# Allegro board MM32SPIN27PF_V10_220608.brd
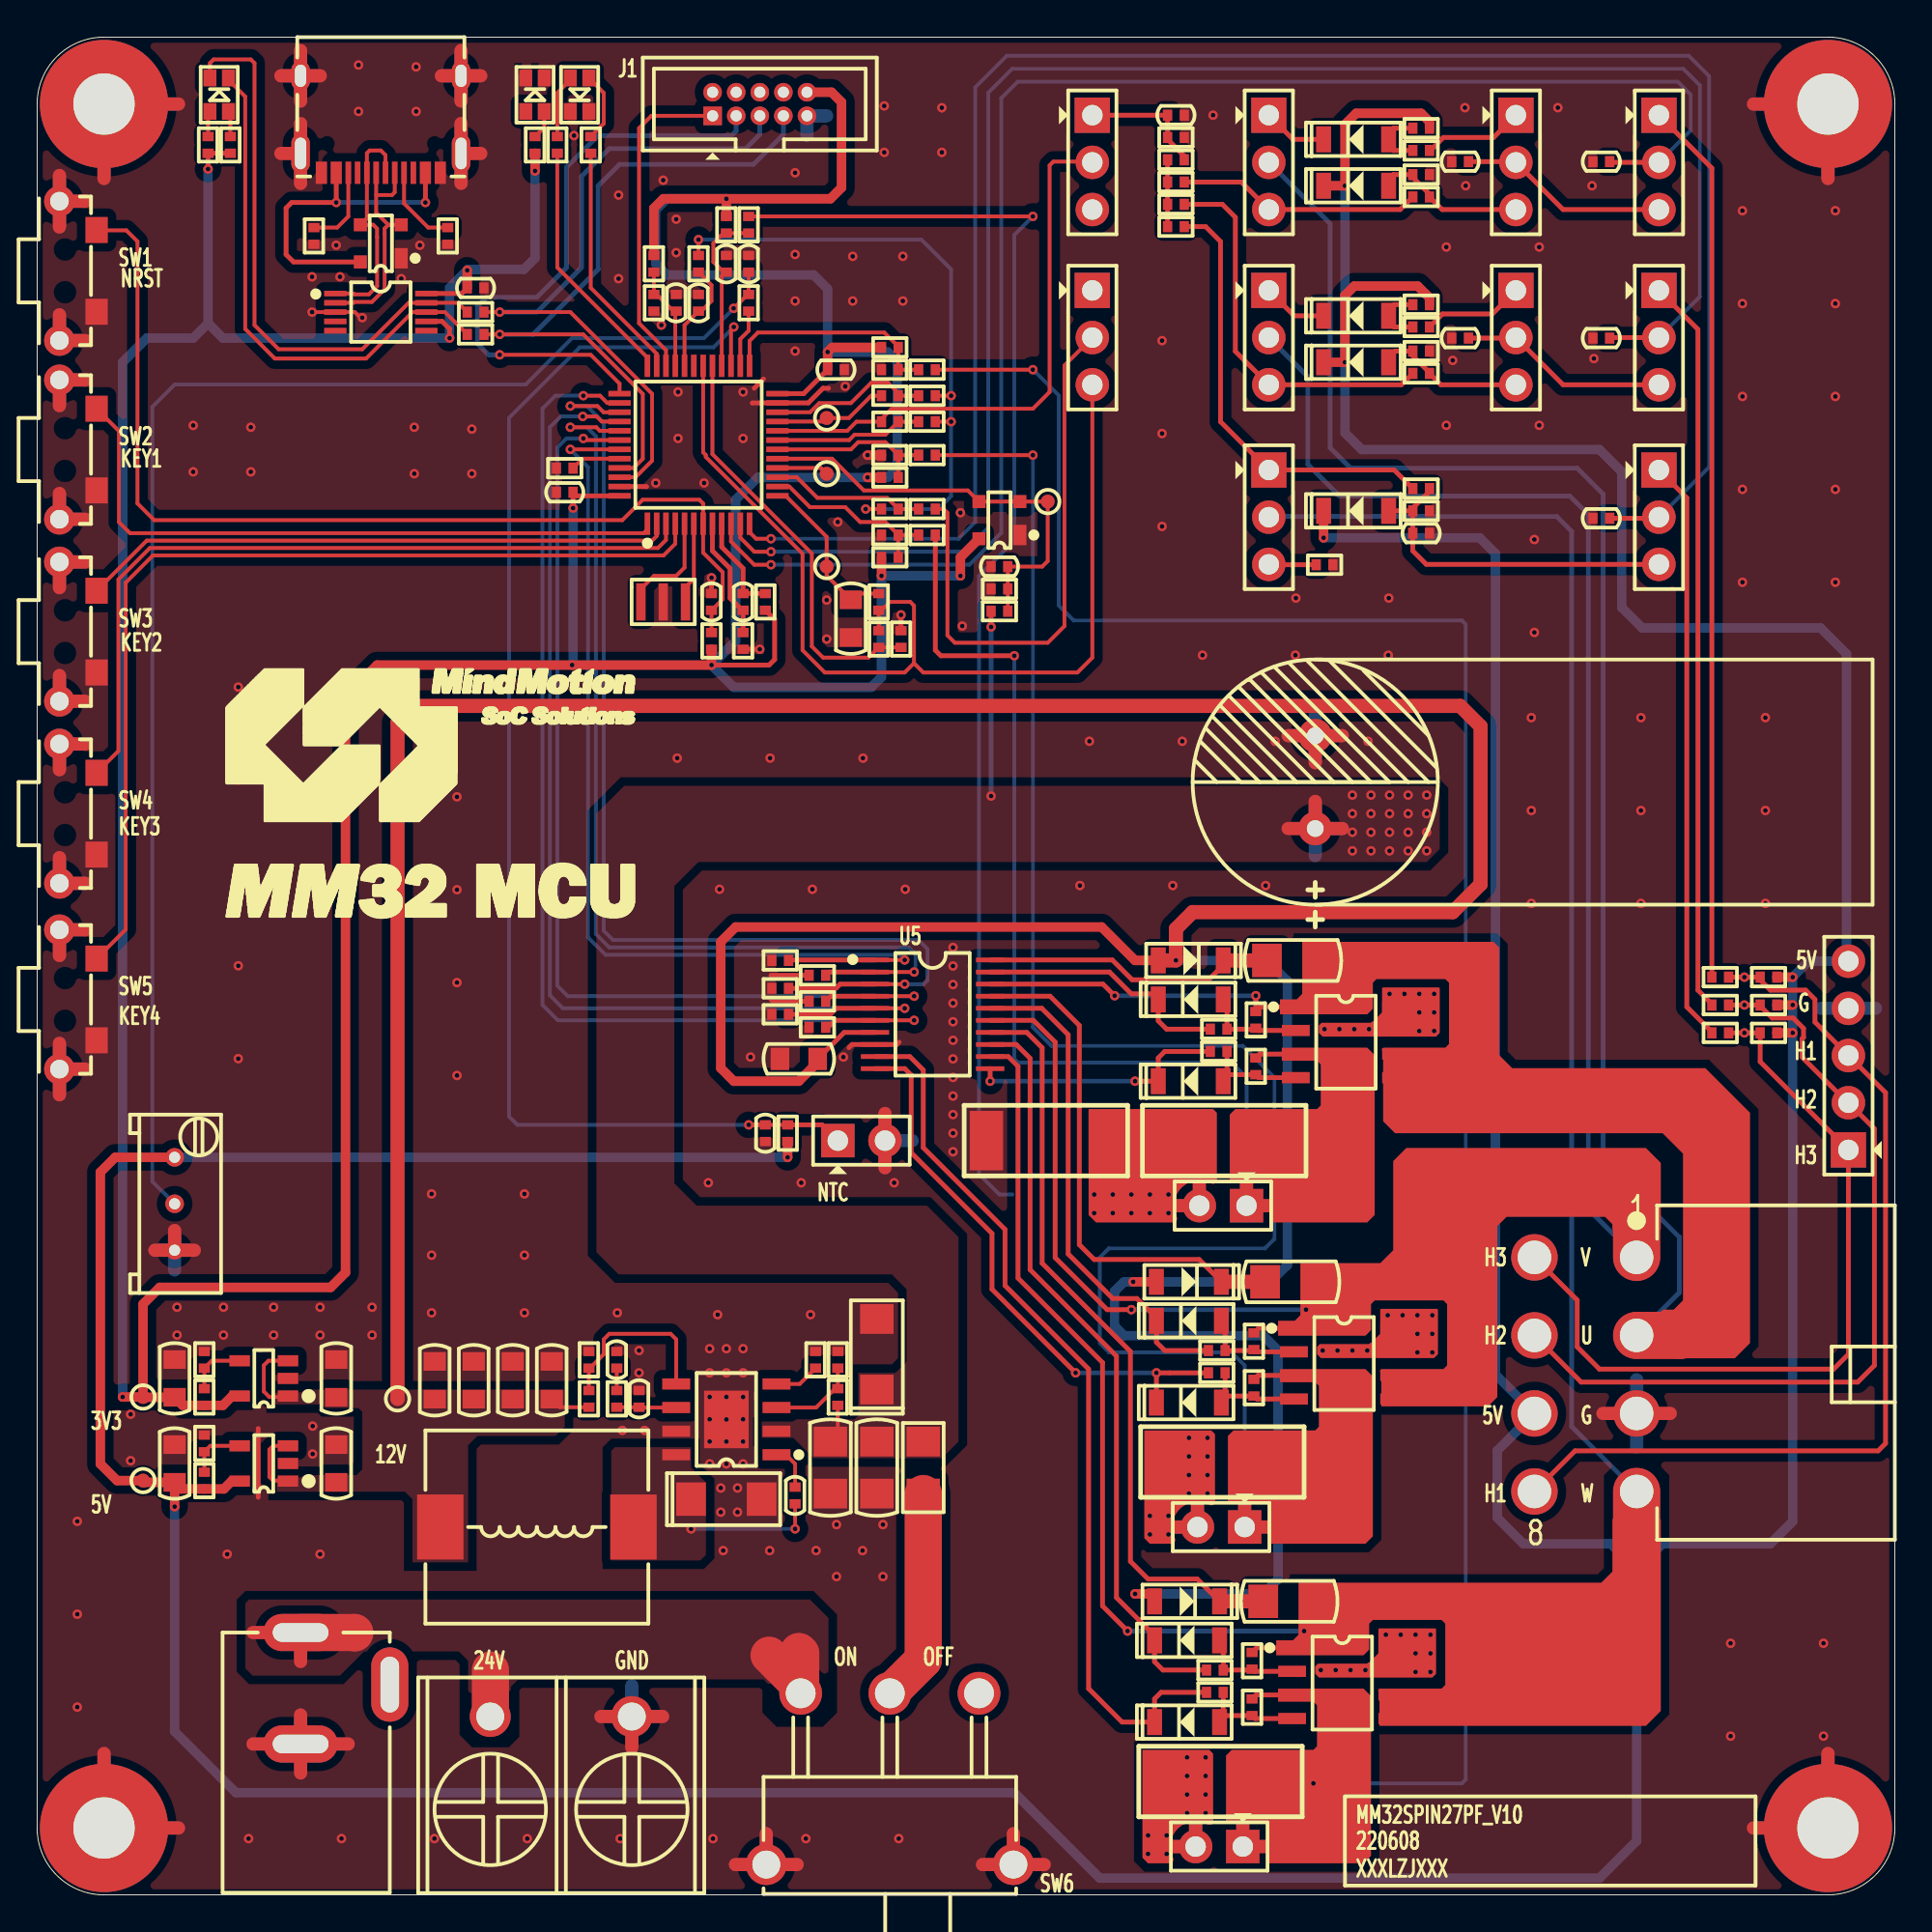
[diagram p0: board, top side]
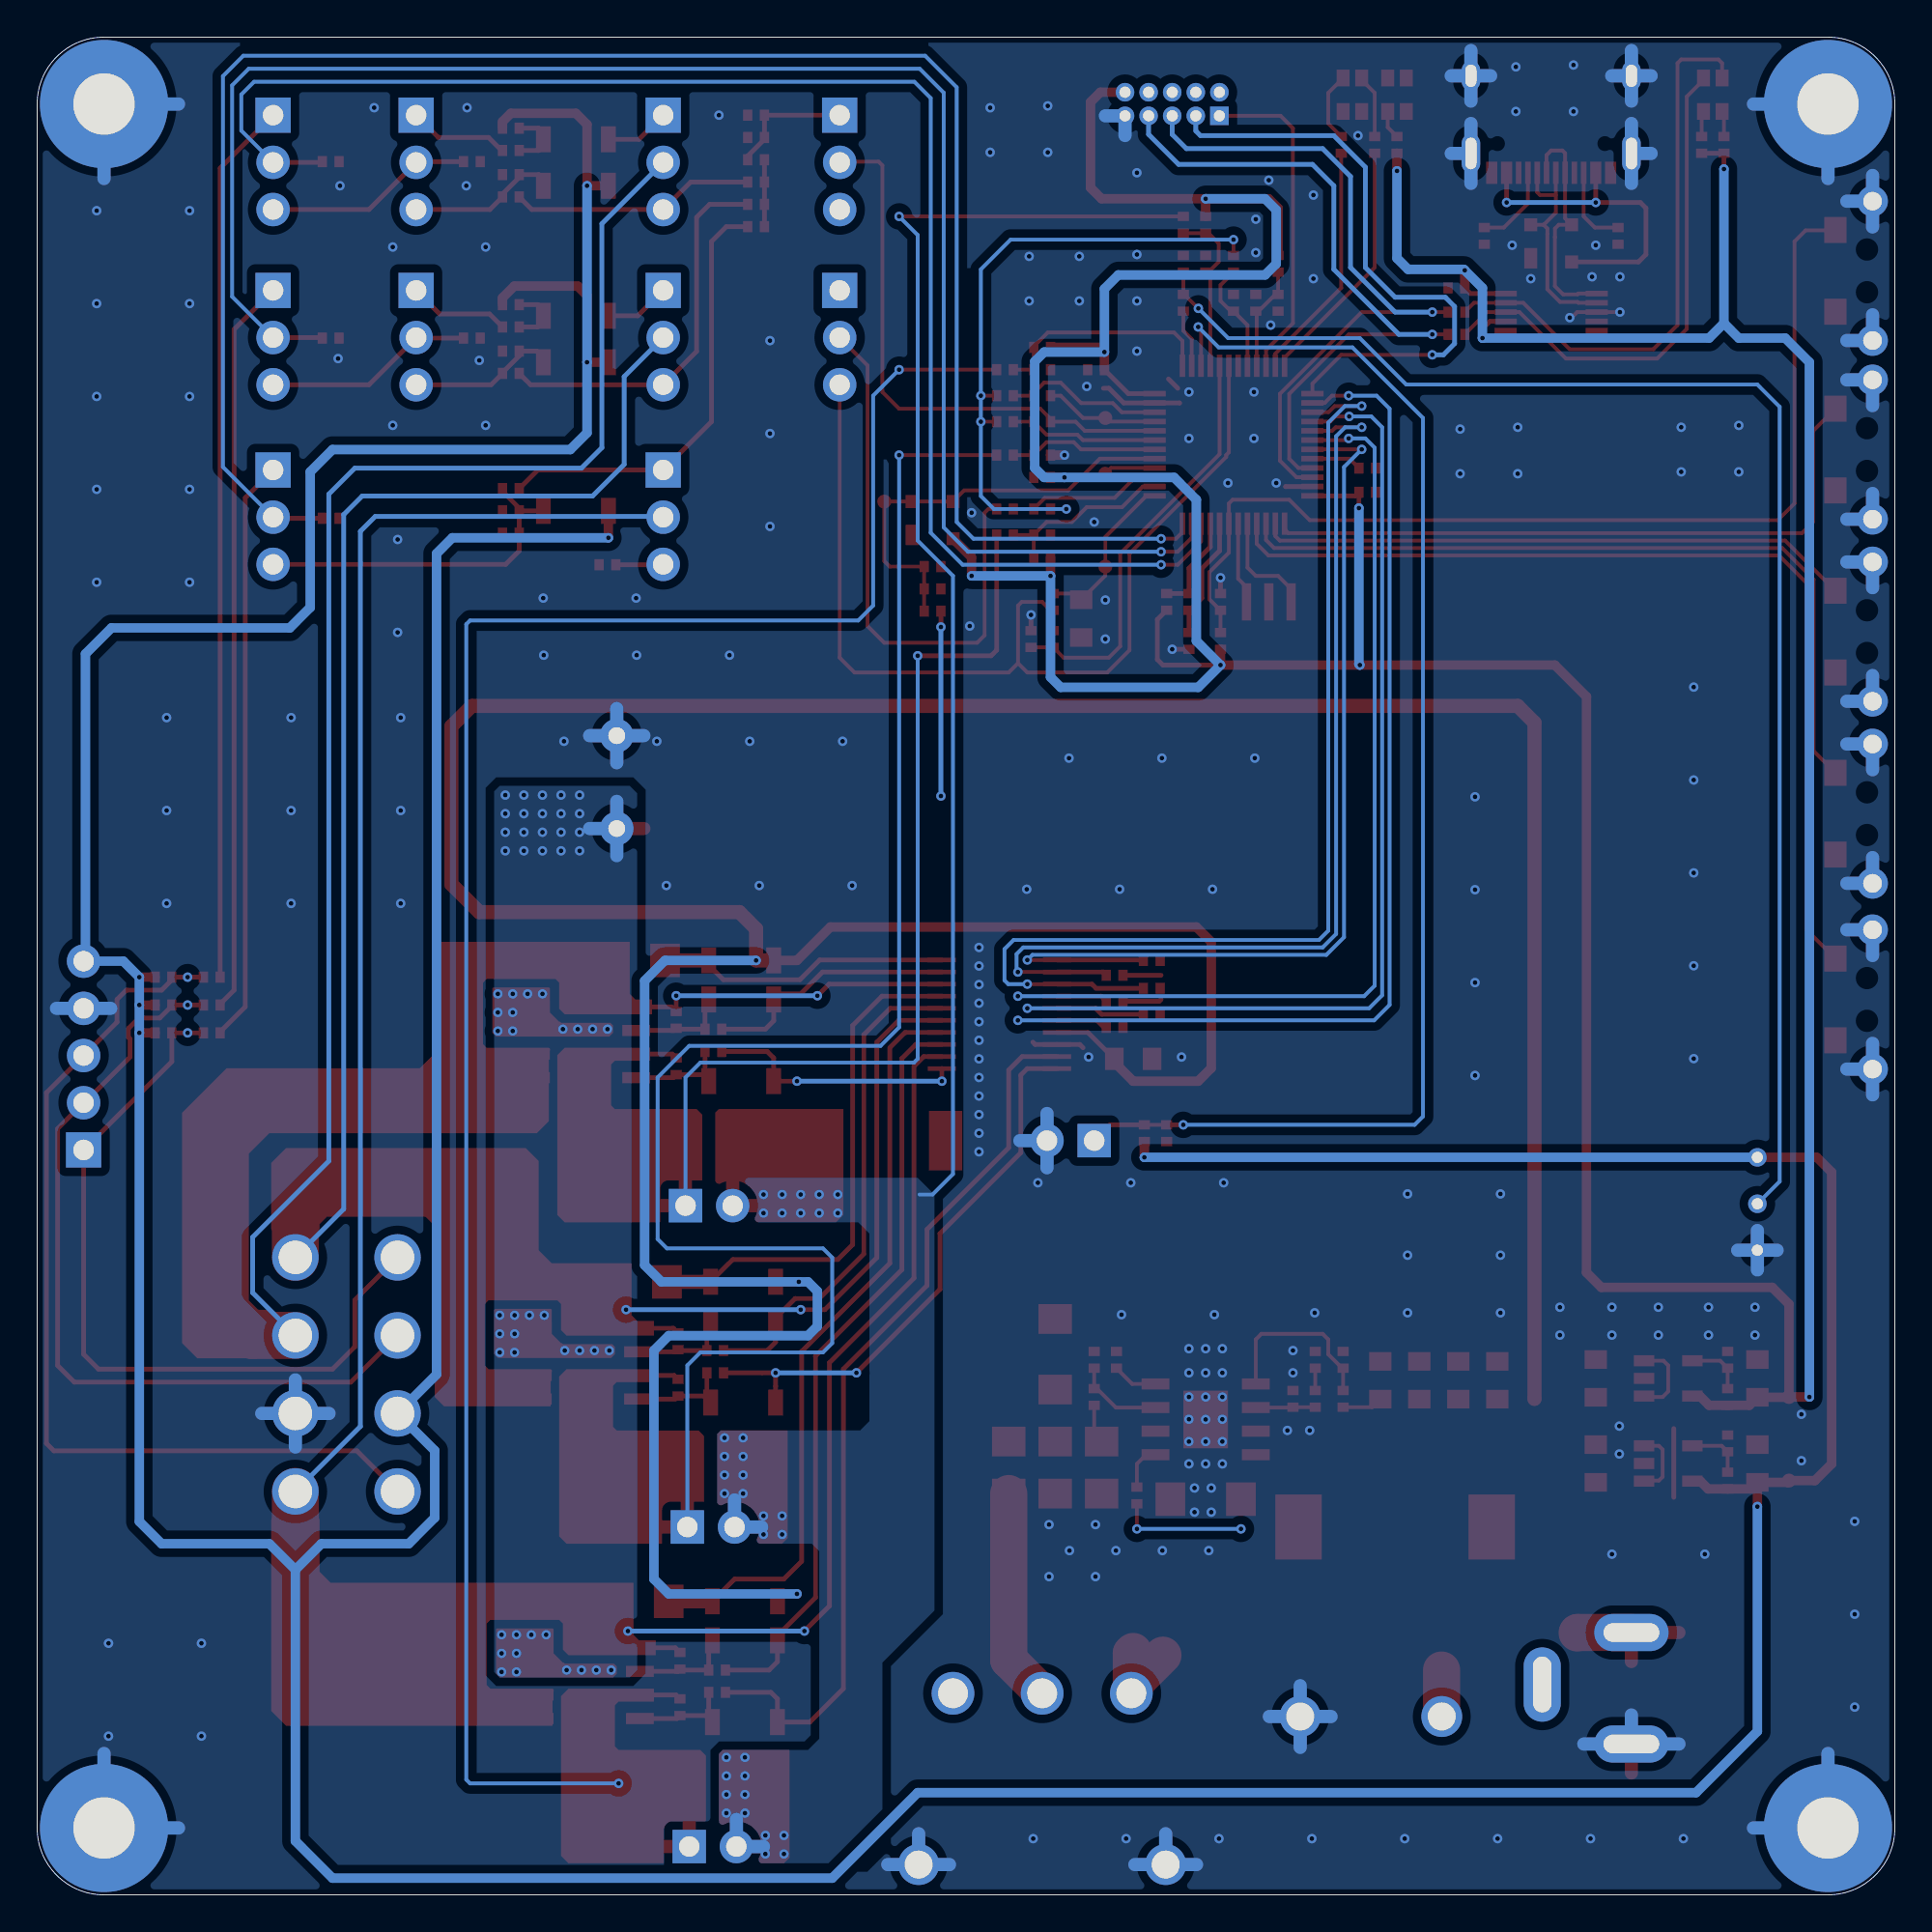
[diagram p1: board, bottom side, seen from below]

Outline 100 x 100 mm; copper layers: TOP, BOTTOM. Coordinates in mm from the lower left corner of the outline.
Outline path: 0,96.4 arc(1.05,98.95) 3.6,100 96.4,100 arc(98.95,98.95) 100,96.4 100,3.6 arc(98.95,1.05) 96.4,0 3.6,0 arc(1.05,1.05) 0,3.6 0,96.4

## Design rules (mm)
constraint set DEFAULT: min track width 0.203, pair gap 0.203
net group USB_D: nets USB_DM USB_DP

## Placement (name value [footprint] x y rotation side)
C1  4.7nF_50V/NI  [C0402]  61.3 95.8 0 top
C2  4.7nF_50V  [C0402]  76.6 93.3 180 top
C3  1nF_50V  [C0402]  84.2 93.3 180 top
C4  100nF_50V  [C0402]  39.2 41 90 top
C5  100nF_50V  [C0402]  38.3 87.8 90 top
C6  100nF_50V  [C0402]  23.6 86.5 180 top
C7  100nF_50V  [C0402]  43 82.1 0 top
C8  4.7nF_50V  [C0402]  76.6 83.8 180 top
C9  1nF_50V  [C0402]  84.2 83.8 180 top
C10  100nF_50V  [C0402]  51.8 71.5 180 top
C11  100pF_50V  [C0402]  34.4 85.7 90 top
C12  100nF_50V  [C0402]  28.4 75.5 180 top
C13  1nF_50V  [C0402]  35.6 85.7 90 top
C14  10uF_25V  [C0805]  43.8 68.7 270 top
C15  100pF_50V  [C0402]  37.1 87.8 90 top
C16  1nF_50V  [C0402]  84.2 74.1 180 top
C17  4.7nF_50V  [C0402]  74.5 73.3 0 top
C18  100nF_50V  [C0402]  36.3 69.6 90 top
C19  100nF_50V  [C0402]  38 69.6 90 top
C20  1000uF_50V  [CAP-5R0-13X27]  68.8 59.9 90 top
C21  4.7uF_50V  [C1206]  67.6 50.3 0 top
C22  10uF_25V  [C0805]  41 45 180 top
C23  4.7uF_50V  [C1206]  67.5 33 0 top
C24  10nF_50V  [C0402]  31.2 28.8 90 top
C25  10uF_25V  [C0805]  7.4 27.8 90 top
C26  10uF_25V  [C0805]  16.1 27.8 90 top
C27  10uF_25V  [C0805]  21.4 27.7 90 top
C28  10uF_25V  [C0805]  23.5 27.7 90 top
C29  10uF_25V  [C0805]  25.6 27.7 90 top
C30  10uF_25V  [C0805]  27.7 27.7 90 top
C31  47pF_50V  [C0402]  32.4 26.7 90 top
C32  10uF_25V  [C0805]  7.4 23.22 90 top
C33  10uF_25V  [C0805]  16.1 23.22 90 top
C34  10uF_50V  [C1206]  42.7 23 270 top
C35  10uF_50V  [C1206]  45.2 23 270 top
C36  100nF_50V  [C0402]  40.8 21.5 270 top
C37  4.7uF_50V  [C1206]  67.4 15.8 0 top
CN1  -  [CN1X5-2P54-Z]  97.5 40.1 90 top
D1  -  [XL-2012SURUGC]  9.8 96.9 270 top
D2  1N4148  [SOD123]  71 94.5 0 top
D3  1N4148  [SOD123]  71 92 0 top
D4  -  [XL-2012SURUGC]  26.8 96.9 270 top
D5  -  [XL-2012SURUGC]  29.2 96.9 90 top
D6  1N4148  [SOD123]  71 85 0 top
D7  1N4148  [SOD123]  71 82.5 0 top
D8  1N4148  [SOD123]  71 74.5 0 top
D9  1N4148  [SOD123]  62.1 50.3 180 top
D10  1N4148  [SOD123]  62.1 48.2 0 top
D11  1N4148  [SOD123]  62.1 43.8 0 top
D12  1N4148  [SOD123]  62 33 180 top
D13  1N4148  [SOD123]  62 30.9 0 top
D14  1N4148  [SOD123]  62 26.5 0 top
D15  SS56F  [SMAF]  45.2 29.1 270 top
D16  SS56F  [SMAF]  37.1 21.3 180 top
D17  1N4148  [SOD123]  61.9 15.8 180 top
D18  1N4148  [SOD123]  61.9 13.7 0 top
D19  1N4148  [SOD123]  61.9 9.3 0 top
DC1  -  [DC005]  14.18 8.12 90 top
F1  0469005.WR  [FUSE1206]  47.7 23 90 top
J1  -  [DC3-10P-Z]  38.9 96.4 180 top
J2  -  [HX42003-8WAF]  86.1 28.01 0 top
J3  KF7.62-2P  [KF7R62-2P]  28.2 9.6 180 top
JP1  -  [CN1X3-2P54-Z]  56.8 86.37 270 top
JP2  -  [CN1X3-2P54-Z]  56.8 95.8 270 top
JP3  -  [CN1X3-2P54-Z]  66.3 95.8 270 top
JP4  -  [CN1X3-2P54-Z]  79.6 95.8 270 top
JP5  -  [CN1X3-2P54-Z]  87.3 95.8 270 top
JP6  -  [CN1X3-2P54-Z]  66.3 86.37 270 top
JP7  -  [CN1X3-2P54-Z]  79.6 86.37 270 top
JP8  -  [CN1X3-2P54-Z]  87.3 86.37 270 top
JP9  -  [CN1X3-2P54-Z]  66.3 76.7 270 top
JP10  -  [CN1X3-2P54-Z]  87.3 76.7 270 top
JP11  -  [CN1X2-2P54-Z]  65.1 37.1 180 top
JP12  -  [CN1X2-2P54-Z]  65 19.8 180 top
JP13  -  [CN1X2-2P54-Z]  64.9 2.6 180 top
L1  SMMS1040-6R8  [L10040]  26.9 19.8 180 top
MH1  HOLE_M3/NI  [HOLE6R90X3R40]  3.6 96.4 0 top
MH2  HOLE_M3/NI  [HOLE6R90X3R40]  96.4 96.4 0 top
MH3  HOLE_M3/NI  [HOLE6R90X3R40]  3.6 3.6 0 top
MH4  HOLE_M3/NI  [HOLE6R90X3R40]  96.4 3.6 0 top
NOREF  -  []  0 0 0 top
NOREF#2  -  []  0 0 0 top
NOREF#3  -  []  0 0 90 top
NOREF#4  -  []  0 0 90 top
NOREF#5  -  []  0 0 90 top
NOREF#6  -  []  0 0 0 top
Q1  NCE6005AS  [SOIC8]  70.45 45.9 270 top
Q2  NCE6005AS  [SOIC8]  70.35 28.6 270 top
Q3  NCE6005AS  [SOIC8]  70.25 11.4 270 top
R1  10K  [R0402]  74.5 95.1 0 top
R2  4.99K/NI  [R0402]  61.3 94.6 180 top
R3  4.7K  [R0402]  9.2 94.2 270 top
R4  4.7K  [R0402]  10.4 94.2 270 top
R5  10K  [R0402]  74.5 93.9 0 top
R6  22K/NI  [R0402]  61.3 93.4 0 top
R7  10K  [R0402]  74.5 92.6 180 top
R8  27K/NI  [R0402]  61.3 92.2 180 top
R9  56K  [R0402]  74.5 91.4 0 top
R10  27K/NI  [R0402]  61.3 91 180 top
R11  27K/NI  [R0402]  61.3 89.8 180 top
R12  4.7K  [R0402]  14.9 89.3 270 top
R13  4.7K  [R0402]  22.1 89.3 90 top
R14  4.7K  [R0402]  28 94.2 90 top
R15  4.7K  [R0402]  29.8 94.2 90 top
R16  10K  [R0402]  40.4 41 270 top
R17  1K  [R0402]  38.3 85.7 270 top
R18  4.7K  [R0402]  26.8 94.2 90 top
R19  10K  [R0402]  74.5 85.6 0 top
R20  1K  [R0402]  23.6 85.2 180 top
R21  10K  [R0402]  74.5 84.4 0 top
R22  1K  [R0402]  23.6 84 180 top
R23  10K  [R0402]  74.5 83.1 180 top
R24  10K  [R0402]  45.9 77.5 180 top
R25  56K  [R0402]  74.5 81.9 0 top
R26  10K  [R0402]  45.9 76.3 0 top
R27  4.99K  [R0402]  47.9 74.6 0 top
R28  10K  [R0402]  28.4 76.8 0 top
R29  10K  [R0402]  45.9 83.3 0 top
R30  1K  [R0402]  47.9 79.3 180 top
R31  10K  [R0402]  51.8 70.3 0 top
R32  4.99K  [R0402]  45.9 79.3 180 top
R33  10K  [R0402]  45.9 82.1 180 top
R34  1K  [R0402]  47.9 77.5 180 top
R35  10K  [R0402]  45.9 72 0 top
R36  100K  [R0402]  51.8 69.1 180 top
R37  1K  [R0402]  47.9 80.7 180 top
R38  1.2K  [R0402]  38.3 89.9 270 top
R39  10K  [R0402]  45.9 73.2 180 top
R40  1K  [R0402]  47.9 82.1 180 top
R41  6.2K  [R0402]  45.3 67.6 90 top
R42  10K  [R0402]  46.5 67.6 90 top
R43  1K  [R0402]  45.9 74.6 0 top
R44  4.99K  [R0402]  45.9 80.7 180 top
R45  2K  [R0402]  33.2 85.7 270 top
R46  56K  [R0402]  74.5 75.7 0 top
R47  10K  [R0402]  45.3 69.6 90 top
R48  1K  [R0402]  47.9 73.2 180 top
R49  10K  [R0402]  74.5 74.5 180 top
R50  10K  [R0402]  33.2 87.8 270 top
R51  1K  [R0402]  35.6 87.8 270 top
R52  0R  [R0402]  39.2 69.6 270 top
R53  36K  [R0402]  37.1 89.9 270 top
R54  10K  [R0402]  69.3 71.6 180 top
R55  10K  [R0402]  36.3 67.5 90 top
R56  0R  [R0402]  38 67.5 270 top
R57  10K/NI  [R0402]  40 50.3 180 top
R58  100R  [R0402]  90.6 46.4 180 top
R59  4.7K  [R0402]  93.2 46.4 0 top
R60  10K/NI  [R0402]  42 49.5 180 top
R61  10K/NI  [R0402]  40 48.8 180 top
R62  10K/NI  [R0402]  42 48.1 180 top
R63  100R  [R0402]  90.6 47.9 180 top
R64  4.7K  [R0402]  93.2 47.9 0 top
R65  10K/NI  [R0402]  40 47.4 180 top
R66  10K  [R0402]  65.6 47.1 90 top
R67  10K/NI  [R0402]  42 46.7 180 top
R68  100R  [R0402]  63.6 46.6 0 top
R69  100R  [R0402]  63.6 45.4 0 top
R70  100R  [R0402]  90.6 49.4 180 top
R71  4.7K  [R0402]  93.2 49.4 0 top
R72  10K  [R0402]  65.6 44.6 270 top
R73  0R05  [R2512]  54.3 40.6 0 top
R74  0R05  [R2512]  63.9 40.6 0 top
R75  MF52A103F3950(A1)  [CN1X2-2P54-Z]  43.1 40.6 0 top
R76  10K  [R0402]  65.5 29.8 90 top
R77  100R  [R0402]  63.5 29.3 0 top
R78  20K  [R0402]  9 28.8 90 top
R79  14.3K  [R0402]  29.7 28.8 90 top
R80  200K  [R0402]  41.9 28.8 270 top
R81  75K  [R0402]  43.1 28.8 270 top
R82  100R  [R0402]  63.5 28.1 0 top
R83  10K  [R0402]  65.5 27.3 270 top
R84  33K  [R0402]  9 26.8 90 top
R85  330K  [R0402]  43.1 26.8 270 top
R86  200K  [R0402]  29.7 26.7 90 top
R87  10K  [R0402]  31.2 26.7 270 top
R88  20K  [R0402]  9 24.3 90 top
R89  0R05  [R2512]  63.8 23.3 0 top
R90  63.4K  [R0402]  9 22.3 90 top
R91  10K  [R0402]  65.4 12.6 90 top
R92  100R  [R0402]  63.4 12.1 0 top
R93  100R  [R0402]  63.4 10.9 0 top
R94  10K  [R0402]  65.4 10.1 270 top
R95  0R05  [R2512]  63.7 6.1 0 top
RP1  3296W-1-503  [3296W]  7.4 37.2 90 top
SW1  -  [K2-1112SW-A4SW-04]  1.5 87.42 90 top
SW2  -  [K2-1112SW-A4SW-04]  1.5 77.8 90 top
SW3  -  [K2-1112SW-A4SW-04]  1.5 68 90 top
SW4  -  [K2-1112SW-A4SW-04]  1.5 58.2 90 top
SW5  -  [K2-1112SW-A4SW-04]  1.5 48.2 90 top
SW6  -  [SS-12D11G3R]  45.9 3.2 180 top
TP1  TP/NI  [TP-0R75]  54.4 75 0 top
TP2  TP/NI  [TP-0R75]  42.5 79.5 0 top
TP3  TP/NI  [TP-0R75]  42.5 76.5 0 top
TP4  TP/NI  [TP-0R75]  42.5 71.5 0 top
TP5  TestPoint/NI  [TP-0R75]  5.7 26.8 0 top
TP6  TP/NI  [TP-0R75]  19.4 26.7 180 top
TP7  TestPoint/NI  [TP-0R75]  5.7 22.3 0 top
U1  PRTR5V0U2X  [SOT143B]  18.5 88.9 90 top
U2  CH340E  [MSOP10]  18.5 85.2 270 top
U3  MM32SPIN27PF  [LQFP48-7X7X0R5]  35.6 78.06 0 top
U4  PRTR5V0U2X  [SOT143B]  51.8 74 90 top
U5  EG2124A  [TSSOP20]  48.2 47.4 270 top
U6  SPX3819M5-L-ADJ  [SOT23-5]  12.2 27.8 90 top
U7  TPS54340DDAR  [SOIC8-3R10X2R40]  37.1 25.59 90 top
U8  SPX3819M5-L-ADJ  [SOT23-5]  12.2 23.22 90 top
USB1  -  [TYPE-C-31-M-12]  18.5 92.7 180 top
X1  CSTCE8M00G15C99-R0  [X-3P-3R2X1R3-SMD]  33.7 69.6 0 top

## Library data of the parts
C1-C5 C8-C11 C13-C17 C24-C36 = CAP NP_3
C6 C7 C12 C19 = CAP NP_2
C18 C21-C23 C37 = CAP NP
C20 = CAPT_100UF_3528_6r3V_10%_LXXXX
CN1 = CONN RCPT 5
D1 D4 D5 = XL-2012SURUGC
D2 D3 D6-D19 = DIODE13_9
DC1 = DC005
F1 = FUSE
J1 = DC3-10P-Z-L
J2 = HX30002-10A_2
J3 JP11-JP13 R75 = CONN RCPT 2
JP1-JP10 = CONN RCPT 3
L1 = INDUCTOR_0
MH1-MH4 = Hold_1
Q1-Q3 = IRF7351TRPBF
R1-R74 R76-R95 = R_Generic
RP1 = 3296W-1-503
SW1-SW5 = SWITCH-SPST-4P
SW6 = SWITCH_3P
TP1-TP7 = TestPoint
U1 U4 = PRTR5V0U2X
U2 = CH340E
U3 = MM32SPIN27PF
U5 = EG2124A
U6 U8 = SPX3819M5-L-1-2
U7 = TPS54340DDAR
USB1 = TYPE-C_0
X1 = XTAL_5032_0

## Footprints (pads in the part's own frame, mm; a bottom-side part is the same pattern mirrored in y, then rotated)
3296W
  round 1 hole 0.6: 1(-2.5,0) 2(0,0) 3(2.5,0)
C0402
  rect 0.5x0.6 smd: 1(-0.45,0) 2(0.45,0)
C0805
  rect 1x1.2 smd: 1(-1.016,0) 2(1.016,0)
C1206
  rect 1.6x1.8 smd: 1(-1.4,0) 2(1.4,0)
CAP-5R0-13X27
  round 1.8 hole 0.9: 1(-2.5,0) 2(2.5,0)
CN1X2-2P54-Z
  rect 1.8x1.8 hole 1.1: 1(0,0)
  round 1.8 hole 1.1: 2(2.54,0)
CN1X3-2P54-Z
  rect 1.9x1.9 hole 1.1: 1(0,0)
  round 1.8 hole 1.1: 2(2.54,0) 3(5.08,0)
CN1X5-2P54-Z
  rect 1.9x1.9 hole 1.1: 1(0,0)
  round 1.8 hole 1.1: 2(2.54,0) 3(5.08,0) 4(7.62,0) 5(10.16,0)
DC3-10P-Z
  rect 1x1 hole 0.6: 1(2.54,0.635)
  round 1 hole 0.6: 2(2.54,-0.635) 3(1.27,0.635) 4(1.27,-0.635) 5(0,0.635) 6(0,-0.635) 7(-1.27,0.635) 8(-1.27,-0.635) 9(-2.54,0.635) 10(-2.54,-0.635)
DC005
  oval 2x4 hole 1x3: 1(6,0) 2(0,0)
  oval 4x2 hole 3x1: 3(3.2,-4.8)
FUSE1206
  rect 1.6x1.8 smd: 1(-1.4,0) 2(1.4,0)
HOLE6R90X3R40
  round 6.9 hole 3.3: 1(0,0)
HX42003-8WAF
  round 2.5 hole 1.8: 1(0,6.3) 2(0,2.1) 3(0,-2.1) 4(0,-6.3) 5(-5.5,6.3) 6(-5.5,2.1) 7(-5.5,-2.1) 8(-5.5,-6.3)
K2-1112SW-A4SW-04
  round 1.65 hole 1: 1(-3.75,0.3) 4(3.75,0.3)
  rect 1.4x1.2 smd: 2(-2.2,-1.7) 3(2.2,-1.7)
KF7R62-2P
  round 2.2 hole 1.5: 1(-3.81,0) 2(3.81,0)
L10040
  rect 2.5x3.5 smd: 1(-5.2,0) 2(5.2,0)
LQFP48-7X7X0R5
  rect 0.3x1.2 smd: 1(-2.75,-4.25) 2(-2.25,-4.25) 3(-1.75,-4.25) 4(-1.25,-4.25) 5(-0.75,-4.25) 6(-0.25,-4.25) 7(0.25,-4.25) 8(0.75,-4.25) 9(1.25,-4.25) 10(1.75,-4.25) 11(2.25,-4.25) 12(2.75,-4.25) 25(2.75,4.25) 26(2.25,4.25) 27(1.75,4.25) 28(1.25,4.25) 29(0.75,4.25) 30(0.25,4.25) 31(-0.25,4.25) 32(-0.75,4.25) 33(-1.25,4.25) 34(-1.75,4.25) 35(-2.25,4.25) 36(-2.75,4.25)
  rect 1.2x0.3 smd: 13(4.25,-2.75) 14(4.25,-2.25) 15(4.25,-1.75) 16(4.25,-1.25) 17(4.25,-0.75) 18(4.25,-0.25) 19(4.25,0.25) 20(4.25,0.75) 21(4.25,1.25) 22(4.25,1.75) 23(4.25,2.25) 24(4.25,2.75) 37(-4.25,2.75) 38(-4.25,2.25) 39(-4.25,1.75) 40(-4.25,1.25) 41(-4.25,0.75) 42(-4.25,0.25) 43(-4.25,-0.25) 44(-4.25,-0.75) 45(-4.25,-1.25) 46(-4.25,-1.75) 47(-4.25,-2.25) 48(-4.25,-2.75)
MSOP10
  rect 0.3x1.2 smd: 1(-1,-2.45) 2(-0.5,-2.45) 3(0,-2.45) 4(0.5,-2.45) 5(1,-2.45) 6(1,2.45) 7(0.5,2.45) 8(0,2.45) 9(-0.5,2.45) 10(-1,2.45)
R0402
  rect 0.5x0.6 smd: 1(-0.45,0) 2(0.45,0)
R2512
  rect 1.8x3.2 smd: 1(-3.2,0) 2(3.2,0)
SMAF
  rect 1.6x1.8 smd: 1(-1.9,0) 2(1.9,0)
SOD123
  rect 0.8x1.4 smd: 1(1.75,0) 2(-1.75,0)
SOIC8
  rect 0.6x1.5 smd: 1(-1.9,-2.7) 2(-0.63,-2.7) 3(0.64,-2.7) 4(1.91,-2.7) 5(1.91,2.7) 6(0.64,2.7) 7(-0.63,2.7) 8(-1.9,2.7)
SOIC8-3R10X2R40
  rect 0.6x1.5 smd: 1(-1.9,-2.7) 2(-0.63,-2.7) 3(0.64,-2.7) 4(1.91,-2.7) 5(1.91,2.7) 6(0.64,2.7) 7(-0.63,2.7) 8(-1.9,2.7)
  rect 3.1x2.4 smd: 9(0,0)
SOT23-5
  rect 0.6x1.1 smd: 1(-0.95,-1.3) 2(0,-1.3) 3(0.95,-1.3) 4(0.95,1.3) 5(-0.95,1.3)
SOT143B
  rect 1.1x0.7 smd: 1(-0.8,-1.1)
  rect 0.7x0.7 smd: 2(1,-1.1) 3(1,1.1) 4(-1,1.1)
SS-12D11G3R
  round 2.2 hole 1.5: 1(-6.65,1.57) 5(6.65,1.57)
  round 2.3 hole 1.6: 2(-4.8,-7.65) 3(0,-7.65) 4(4.8,-7.65)
TP-0R75
  round 0.75 smd: 1(0,0)
TSSOP20
  rect 0.25x1.52 smd: 1(-2.925,-3.1) 2(-2.275,-3.1) 3(-1.625,-3.1) 4(-0.975,-3.1) 5(-0.325,-3.1) 6(0.325,-3.1) 7(0.975,-3.1) 8(1.625,-3.1) 9(2.275,-3.1) 10(2.925,-3.1) 11(2.925,3.1) 12(2.275,3.1) 13(1.625,3.1) 14(0.975,3.1) 15(0.325,3.1) 16(-0.325,3.1) 17(-0.975,3.1) 18(-1.625,3.1) 19(-2.275,3.1) 20(-2.925,3.1)
TYPE-C-31-M-12
  rect 0.6x1.2 smd: 1(-3.2,0) 2(-2.4,0) 11(2.4,0) 12(3.2,0)
  rect 0.3x1.2 smd: 3(-1.75,0) 4(-1.25,0) 5(-0.75,0) 6(-0.25,0) 7(0.25,0) 8(0.75,0) 9(1.25,0) 10(1.75,0)
  oval 1x2.1 hole 0.6x1.7: 13(-4.32,-1.04) 14(4.32,-1.04)
  oval 1x1.6 hole 0.6x1.2: 15(-4.32,-5.22) 16(4.32,-5.22)
X-3P-3R2X1R3-SMD
  rect 0.5x2 smd: 1(-1.2,0) 2(0,0) 3(1.2,0)
XL-2012SURUGC
  rect 0.9x0.7 smd: 1(-0.9,0.5) 2(0.9,0.5) 3(-0.9,-0.5) 4(0.9,-0.5)

## Nets
GND: C1.2 C2.2 C3.2 C4.1 C5.2 C6.1 C7.2 C8.2 C9.2 C10.2 C11.2 C12.2 C13.2 C14.2 C15.2 C16.2 C17.2 C18.2 C20.2 C22.2 C24.2 C25.2 C26.2 C27.2 C28.2 C29.2 C30.2 C31.2 C32.2 C33.2 C34.2 C35.2 CN1.4 D4.1(R-) D4.3 D5.1(R-) D5.3 D15.1 D16.1 DC1.2 J1.9 J2.3 J3.1 MH1.1 MH2.1 MH3.1 MH4.1 R2.1 R7.1 R12.2 R13.1 R23.1 R24.2 R28.1 R31.1 R33.2 R39.2 R42.2 R45.2 R49.1 R54.1 R56.2 R57.2 R60.2 R61.2 R62.2 R65.2 R67.2 R73.1 R75.2 R78.2 R79.2 R80.1 R81.1 R88.2 RP1.1 SW1.1 SW1.2 SW1.4 SW2.1 SW2.2 SW2.4 SW3.1 SW3.2 SW3.4 SW4.1 SW4.2 SW4.4 SW5.1 SW5.2 SW5.4 SW6.1 SW6.5 U1.1 U2.3 U3.23 U3.47(VSS_2) U4.1 U5.8 U6.2 U7.7 U7.9 U8.2 USB1.1 USB1.12 USB1.13 USB1.14 USB1.15 USB1.16 X1.2
VCC_3.3V: C6.2 C7.1 C12.1 C25.1 J1.10 R3.2 R4.2 R18.1 R26.1 R29.1 R35.1 R50.1 R52.2 R53.1 R55.1 R84.1 TP5.1 U2.7(VCC) U2.10 U3.24 U3.48 U4.4 U6.5(VOUT)
VCC_5V: C32.1 CN1.5 D3.2(ANODE_2) D7.2(ANODE_2) D8.2(ANODE_2) J2.7 R1.2 R16.2 R19.2 R59.2 R64.2 R71.2 R90.1 RP1.3 TP7.1 U8.5(VOUT)
VCC_5V_USB: U1.4 USB1.2 USB1.11(VBUS2)
VCC_12V: C22.1 C26.1 C27.1 C28.1 C29.1 C30.1 C33.1 D9.1 D12.1 D17.1 L1.2 R86.1 TP6.1 U5.7 U6.1 U6.3 U8.1 U8.3
VCC_24V: C20.1 C34.1 C35.1 D15.2(ANODE_2) F1.2 Q1.7 Q1.8 Q2.7 Q2.8 Q3.7 Q3.8 R36.2 R85.2 U7.2(VIN)
VCC_24V_IN: DC1.1 J3.2 SW6.4
VDDA: C19.2 R52.1 U3.9
VSSA: C19.1 R56.1 U3.8
BEMF_O: JP2.2 R32.2 U3.20
CH340E_RXD: D1.3 R20.2 U2.9
CH340E_TXD: D1.1(R-) R22.2 U2.8
H1: CN1.3 J2.8 R70.1 R71.1
H2: CN1.2 J2.6 R63.1 R64.1
H3: CN1.1 J2.5 R58.1 R59.1
HO1: D10.2(ANODE_2) R68.1 U5.19
HO2: D13.2(ANODE_2) R77.1 U5.16
HO3: D18.2(ANODE_2) R92.1 U5.13
IR_SUM: JP11.2 JP12.2 JP13.2 R38.1 R73.2 R74.1 R89.1 R95.1
IR_U: JP11.1 Q1.3(S2) R48.1 R72.1 R74.2
IR_V: JP12.1 Q2.3(S2) R34.1 R83.1 R89.2
IR_W: JP13.1 Q3.3(S2) R40.1 R94.1 R95.2
LO1: D11.2(ANODE_2) R69.1 U5.11
LO2: D14.2(ANODE_2) R82.1 U5.10
LO3: D19.2(ANODE_2) R93.1 U5.9
MOTOR_U: C21.2 J2.2 JP3.2 Q1.1 Q1.5 Q1.6 R66.2 U5.18
MOTOR_V: C23.2 J2.1 JP6.2 Q2.1 Q2.5 Q2.6 R76.2 U5.15
MOTOR_W: C37.2 J2.4 JP9.2 Q3.1 Q3.5 Q3.6 R91.2 U5.12(VS3)
NRST: C18.1 R55.2 SW1.3 U3.7
OSC_IN: U3.5 X1.1
OSC_OUT: U3.6 X1.3
PA0/BEMF_U: C3.1 JP5.2 U3.10
PA1/BEMF_V: C9.1 JP8.2 U3.11
PA2/BEMF_W: C16.1 JP10.2 U3.12
PA3: C14.1 R47.2 TP4.1 U3.13
PA4: R35.2 R39.1 R48.2 U3.14
PA5: R27.1 R43.2 U3.15
PA6: TP3.1 U3.16
PA7/VDC: C10.1 R31.2 R36.1 TP1.1 U3.17 U4.2 U4.3
PA8: R41.1 R42.1 U3.29
PA11: C13.1 R51.2 U3.32
PA12: C11.1 R45.1 R50.2 U3.33
PA15/TIM_CH3N: R67.1 U3.38 U5.6
PB0: R24.1 R26.2 R34.2 U3.18
PB1: R30.2 R32.1 U3.19
PB3/TIM_CH3: R61.1 U3.39 U5.3
PB4/TIM_CH2N: R65.1 U3.40 U5.5
PB5/TIM_CH2: R60.1 U3.41 U5.2
PB6/TIM_CH1N: R62.1 U3.42 U5.4
PB7/TIM_CH1: R57.1 U3.43 U5.1
PB8/UART1_RX: J1.7 R22.1 U3.45
PB9/UART1_TX: J1.5 R20.1 U3.46
PB10: R44.2 TP2.1 U3.21
PB11: R37.2 R44.1 U3.22
PB12: R29.2 R33.1 R40.2 U3.25
PB13/SPEED: R17.2 U3.26
PB14/TEMP: C4.2 R16.1 R75.1 U3.27
PB15: C15.1 R38.2 R53.2 U3.28
PC13/KEY2: SW3.3 U3.2
PC14/KEY3: SW4.3 U3.3
PC15/KEY4: SW5.3 U3.4
PD2/LED0: R15.1 U3.35
PD3/LED1: R14.1 U3.36
PD7/KEY1: SW2.3 U3.1
SV: JP1.3 R41.2 R47.1 U3.30
SWCLK: J1.3 U3.37
SWDIO: J1.1 U3.34
U_S_IN: JP1.2 R27.2
USB_DM: U1.2 U2.2 USB1.5 USB1.7
USB_DP: U1.3 U2.1 USB1.6 USB1.8
UV: JP1.1
VB1: C21.1 D9.2(ANODE_2) U5.20
VB2: C23.1 D12.2(ANODE_2) U5.17
VB3: C37.1 D17.2(ANODE_2) U5.14
VV: JP2.3
N17256471: R28.2 U3.44
N17256486: D4.2 R18.2
N17256513: R12.1 USB1.10
N17256515: R13.2 USB1.4
N17279585: D1.2 R4.1
N17279608: D1.4 R3.1
N17297966: R30.1 R37.1 R43.1 R51.1
N17303513: D10.1 Q1.2 R66.1 R68.2
N17303600: D11.1 Q1.4 R69.2 R72.2
N17305088: D13.1 Q2.2 R76.1 R77.2
N17305164: D14.1 Q2.4 R82.2 R83.2
N17305624: D18.1 Q3.2 R91.1 R92.2
N17305700: D19.1 Q3.4 R93.2 R94.2
N17307857: C5.1 R17.1 RP1.2
N17309304: D2.1 R1.1 R5.1
N17309352: D2.2(ANODE_2) JP3.1
N17309419: D3.1 JP4.3 R7.2 R9.2
N17309488: JP4.1 R5.2
N17309495: JP3.3 R8.1 R9.1
N17309514: C2.1 JP4.2 JP5.3
N17309709: JP5.1 R70.2
N17309934: JP8.1 R63.2
N17309953: D6.1 R19.1 R21.1
N17309955: D7.1 JP7.3 R23.2 R25.2
N17309983: D6.2(ANODE_2) JP6.1
N17309989: JP7.1 R21.2
N17310005: C8.1 JP7.2 JP8.3
N17310013: JP6.3 R10.1 R25.1
N17310426: C17.1 D8.1 JP10.3 R46.2 R49.2
N17310462: JP10.1 R58.2
N17310486: JP9.3 R54.2
N17311196: JP9.1 R11.1 R46.1
N17311295: R6.1 R8.2 R10.2 R11.2
N17311437: C1.1 JP2.1 R2.2 R6.2
N17322936: D5.2 R14.2
N17322948: D5.4 R15.2
N17331274: F1.1 SW6.3
N17333710: R78.1 R84.2 U6.4
N17334296: R88.1 R90.2 U8.4
N17334949: C36.1 U7.1
N17334953: C36.2 D16.2(ANODE_2) L1.1 U7.8
N17335086: R79.1 R86.2 U7.5
N17335114: R81.2 R85.1 U7.3
N17335118: C31.1 R87.2 U7.6
N17335142: R80.2 U7.4
N17335200: C24.1 R87.1

Pads without a net: D4 4; DC1 3; J1 2 4 6 8; SW6 2; U2 4 5 6; U3 31; USB1 3 9

## Via types
v1: diameter 0.508, hole 0.254, TOP to BOTTOM, 370 vias

## Routing (per net, layer and track width the routed paths; a pad name or vN(x,y) marks a point on that pad's centre or on a via; arc(x,y) is an arc through that point)
GND: length 272.1
  TOP w0.203: 17.3,85 17.1,85.2 U2.3 v1(14.8,85.2)
  TOP w0.254: 38.5,80.3 38.51,80.31 U3.23 41.51,80.31 42.3,81.1 42.6,81.1 ; R62.2 41.5,48.1 ; 41.5,48.1 41.4,48.2 ; 41.5,48.1 39.6,48.1 39.5,48.2 ; C18.2 v1(36.3,70.9) ; 39.1,81.6 38.6,81.1 ; R42.2 v1(46.5,68.9) ; R56.2 v1(38.9,67.05) ; 32.8,75.8 32.79,75.81 U3.47 ; 43.7,45.6 43.88,45.77 U5.8 46.27,45.77 46.4,45.9 ; R60.2 39.5,49.5 ; 11.9,25.1 11.9,21.4
  TOP w0.508: R24.2 v1(44.7,77.5)
  TOP w0.711: 3.6,7.61 MH3.1 7.61,3.6 ; C20.2 70.26,62.4 ; C20.2 68.8,60.94 ; C20.2 67.34,62.4 ; 2.58,61.95 SW4.4 1.2,60.57 ; 22.82,96.56 USB1.15 ; USB1.15 21.76,97.92 ; USB1.15 23.88,97.92 ; USB1.15 22.82,99.28 ; 13.12,97.92 USB1.16 ; USB1.16 15.24,97.92 ; USB1.16 14.18,99.28 ; USB1.16 14.18,96.56 ; 14.18,6.56 DC1.2 ; DC1.2 16.74,8.12 ; DC1.2 14.18,9.68 ; DC1.2 11.62,8.12 ; 2.58,54.45 SW4.1 1.2,55.83 ; 32.01,7.94 J3.1 ; J3.1 30.35,9.6 ; J3.1 33.67,9.6 ; USB1.14 14.18,95.35 ; USB1.14 13.12,93.74 ; USB1.14 14.18,92.13 ; USB1.13 23.88,93.74 ; USB1.13 22.82,92.13 ; USB1.13 22.82,95.35 ; SW6.5 39.25,3.29 ; SW6.5 37.59,1.63 ; SW6.5 40.91,1.63 ; 7.61,96.4 MH1.1 3.6,92.39 ; 2.58,83.67 SW1.1 1.2,85.05 ; 96.4,92.39 MH2.1 92.39,96.4 ; SW6.1 52.55,3.29 ; SW6.1 54.21,1.63 ; SW6.1 50.89,1.63 ; SW5.1 1.2,45.83 ; SW5.1 1.2,43.07 ; SW5.1 2.58,44.45 ; 2.58,64.25 SW3.1 1.2,65.63 ; SW1.4 1.2,92.55 ; SW1.4 2.58,91.17 ; SW1.4 1.2,89.79 ; 45.64,39.14 R75.2 45.64,42.06 ; RP1.1 7.4,35.76 ; RP1.1 6.34,34.7 ; RP1.1 8.46,34.7 ; 1.2,70.37 SW3.4 2.58,71.75 ; 2.58,51.95 SW5.4 1.2,50.57 ; 84.29,25.91 J2.3 87.91,25.91 ; 2.58,81.55 SW2.4 1.2,80.17 ; 1.2,75.43 SW2.1 2.58,74.05 ; 92.39,3.6 MH4.1 96.4,7.61
  BOTTOM w0.711: 2.58,71.75 SW3.4 1.2,70.37 ; 14.18,92.13 USB1.14 ; USB1.14 13.12,93.74 ; USB1.14 14.18,95.35 ; USB1.15 22.82,99.28 ; USB1.15 22.82,96.56 ; USB1.15 21.76,97.92 ; USB1.15 23.88,97.92 ; C20.2 68.8,63.86 ; C20.2 68.8,60.94 ; C20.2 70.26,62.4 ; C20.2 67.34,62.4 ; 1.2,80.17 SW2.4 2.58,81.55 ; 96.4,92.39 MH2.1 92.39,96.4 ; 3.6,7.61 MH3.1 7.61,3.6 ; 98.96,47.72 CN1.4 96.04,47.72 ; 84.29,25.91 J2.3 ; J2.3 87.91,25.91 ; J2.3 86.1,27.72 ; J2.3 86.1,24.11 ; SW5.1 2.58,44.45 ; SW5.1 1.2,45.83 ; SW5.1 1.2,43.07 ; 1.2,55.83 SW4.1 2.58,54.45 ; USB1.16 15.24,97.92 ; USB1.16 14.18,96.56 ; USB1.16 14.18,99.28 ; USB1.16 13.12,97.92 ; 1.2,85.05 SW1.1 2.58,83.67 ; 32.01,7.94 J3.1 ; J3.1 30.35,9.6 ; J3.1 33.67,9.6 ; J3.1 32.01,11.26 ; 22.82,92.13 USB1.13 ; USB1.13 23.88,93.74 ; USB1.13 22.82,95.35 ; 1.2,50.57 SW5.4 2.58,51.95 ; 1.2,89.79 SW1.4 ; SW1.4 2.58,91.17 ; SW1.4 1.2,92.55 ; 7.4,33.64 RP1.1 ; RP1.1 8.46,34.7 ; RP1.1 7.4,35.76 ; RP1.1 6.34,34.7 ; 41.44,94.71 J1.9 42.5,95.77 ; 45.64,39.14 R75.2 ; R75.2 47.1,40.6 ; R75.2 45.64,42.06 ; SW6.1 54.21,1.63 ; SW6.1 52.55,3.29 ; SW6.1 50.89,1.63 ; 37.59,1.63 SW6.5 ; SW6.5 39.25,3.29 ; SW6.5 40.91,1.63 ; 11.62,8.12 DC1.2 ; DC1.2 14.18,9.68 ; DC1.2 16.74,8.12 ; 2.58,74.05 SW2.1 1.2,75.43 ; 92.39,3.6 MH4.1 96.4,7.61 ; 2.58,64.25 SW3.1 1.2,65.63 ; 3.6,92.39 MH1.1 7.61,96.4 ; 1.2,60.57 SW4.4 2.58,61.95
  vias: v1(2.16,20.11) v1(2.16,15.11) v1(2.16,10.11) v1(5.03,25.87) v1(5.03,23.37) v1(7.53,31.63) v1(7.53,30.13) v1(8.4,79.1) v1(8.4,76.6) v1(10.03,31.63) v1(10.03,30.13) v1(10.23,18.34) v1(10.83,65.01) v1(10.83,60.01) v1(10.83,55.01) v1(10.83,50.01) v1(10.83,45.01) v1(11.38,3.03) v1(11.5,79) v1(11.5,76.6) v1(12.73,31.63) v1(12.73,30.13) v1(14.8,87.1) v1(14.83,25.23) v1(14.83,23.73) v1(15.23,31.63) v1(15.23,30.13) v1(15.23,18.34) v1(16.1,88.8) v1(16.3,87.1) v1(16.38,3.03) v1(17.3,98.5) v1(17.3,96) v1(17.5,84.9) v1(18.03,31.63) v1(18.03,30.13) v1(19.6,87) v1(20.3,79) v1(20.3,76.5) v1(20.4,98.4) v1(20.4,96) v1(20.6,88.8) v1(21.23,37.73) v1(21.23,34.43) v1(21.23,31.33) v1(21.38,3.03) v1(22.6,59.11) v1(22.6,54.11) v1(22.6,49.11) v1(22.6,44.11) v1(23.4,78.9) v1(23.4,76.5) v1(26.23,37.73) v1(26.23,34.43) v1(26.23,31.33) v1(26.38,3.03) v1(28.9,94.7) v1(31.23,31.33) v1(31.3,91.5) v1(31.3,87) v1(31.38,3.03) v1(31.5,25) v1(32.4,29.3) v1(32.4,28.1) v1(32.7,25) v1(33.3,76) v1(33.6,84.5) v1(33.7,92.3) v1(34.4,90.2) v1(34.4,88.4) v1(34.5,80.9) v1(34.5,78.4) v1(34.45,61.19) v1(35.9,76) v1(36.13,38.33) v1(36.2,29.4) v1(36.2,28.1) v1(36.2,26.8) v1(36.2,25.6) v1(36.2,24.4) v1(36.2,23.2) v1(36.38,3.03) v1(36.63,31.23) v1(36.73,54.13) v1(36.8,21.9) v1(36.8,20.6) v1(36.93,18.53) v1(37.1,29.4) v1(37.1,28.1) v1(37.1,26.8) v1(37.1,25.59) v1(37.1,24.4) v1(37.1,23.2) v1(37.7,21.9) v1(37.7,20.6) v1(38,80.9) v1(38,78.4) v1(38,29.4) v1(38,28.1) v1(38,26.8) v1(38,25.6) v1(38,24.4) v1(38,23.2) v1(38.4,45.1) v1(39.43,18.53) v1(39.45,61.19) v1(40.8,92.7) v1(40.8,88.3) v1(40.8,85.8) v1(40.8,83.1) v1(41.13,38.33) v1(41.38,3.03) v1(41.63,31.23) v1(41.73,54.13) v1(41.93,18.53) v1(42.5,69.7) v1(42.5,67.6) v1(43.03,19.93) v1(43.03,17.13) v1(43.1,73.9) v1(43.4,45.1) v1(43.5,81.2) v1(43.9,88.2) v1(43.9,85.8) v1(44.43,18.53) v1(44.45,61.19) v1(45.53,19.93) v1(45.53,17.13) v1(45.6,96.3) v1(45.6,93.8) v1(46.13,38.33) v1(46.38,3.03) v1(46.6,88.2) v1(46.6,85.8) v1(46.73,54.13) v1(48.7,96.2) v1(48.7,93.8) v1(49.3,51) v1(49.3,50) v1(49.3,49) v1(49.3,48) v1(49.3,47) v1(49.3,46) v1(49.3,45) v1(49.3,44) v1(49.3,43) v1(49.3,42) v1(49.3,41) v1(49.3,40) v1(49.7,74.4) v1(49.8,68.3) v1(56.13,54.33) v1(56.64,62.1) v1(60.55,83.66) v1(60.55,78.66) v1(60.55,73.66) v1(61.13,54.33) v1(61.64,62.1) v1(62.73,66.73) v1(63.3,95.8) v1(66.13,54.33) v1(66.64,62.1) v1(67.73,66.73) v1(67.76,69.8) v1(71.64,62.1) v1(72.73,66.73) v1(72.76,69.8) v1(75.86,88.7) v1(75.86,79.1) v1(76.2,82.6) v1(76.86,96.2) v1(76.9,92) v1(80.43,63.37) v1(80.43,58.37) v1(80.43,53.37) v1(80.6,72.96) v1(80.6,67.96) v1(80.86,88.7) v1(80.86,79.1) v1(81.86,96.2) v1(83.7,92) v1(83.8,82.7) v1(86.33,63.37) v1(86.33,58.37) v1(86.33,53.37) v1(91.16,13.54) v1(91.16,8.54) v1(91.8,90.66) v1(91.8,85.66) v1(91.8,80.66) v1(91.8,75.66) v1(91.8,70.66) v1(93.03,63.37) v1(93.03,58.37) v1(93.03,53.37) v1(96.16,13.54) v1(96.16,8.54) v1(96.8,90.66) v1(96.8,85.66) v1(96.8,80.66) v1(96.8,75.66) v1(96.8,70.66)
VCC_3.3V: length 297.8
  TOP w0.254: v1(9.2,92.9) R3.2 R4.2 ; v1(22.2,83.8) 22.2,84.3 21.8,84.7 U2.7 ; C6.2 22.85,86.2 U2.10 ; U3.24 41.26,80.81 C7.1 ; R52.2 39.7,68.65 39.7,66.5 39.4,66.2 v1(36.3,66.2) ; U3.48 29.04,75.31 C12.1 v1(28.85,74.65)
  TOP w0.508: v1(37.1,91.3) 33.71,91.3 33.2,90.79 R50.1 ; v1(37.1,91.3) R53.1 ; v1(37.1,91.3) 42.7,91.3 43.3,91.9 43.3,96.5 42.77,97.03 J1.10 ; R18.1 v1(26.8,92.8) ; C7.1 v1(42.55,83.05) 42.8,83.3 R29.1 ; U4.4 49.7,72 v1(49.7,71) ; R35.1 v1(45.45,71) ; R55.1 v1(36.3,66.2) v1(28.8,66.2) 18.3,66.2 16.6,64.5 16.6,33.5 15.8,32.7 6.6,32.7 5.7,31.8 TP5.1 ; C6.2 v1(23.15,87.45) ; TP5.1 5.72,26.78 C25.1 7.83,26.35 R84.1 10,26.35 10.5,26.85 U6.5 ; TP5.1 v1(4.6,26.8) ; R26.1 v1(44.7,76.3)
  BOTTOM w0.508: 9.2,84.6 v1(9.2,92.9) ; 9.2,84.6 8.4,83.8 5.9,83.8 4.6,82.5 v1(4.6,26.8) ; 9.2,84.6 10,83.8 v1(22.2,83.8) 22.2,86.5 v1(23.15,87.45) 23.2,87.5 26.2,87.5 26.8,88.1 v1(26.8,92.8) ; v1(28.8,66.2) 28.85,66.25 v1(28.85,74.65) ; v1(37.1,91.3) 33.9,91.3 33.3,90.7 33.3,87.8 33.9,87.2 41.8,87.2 42.55,86.45 v1(42.55,83.05) 45.79,83.05 46.3,82.54 46.3,76.81 45.79,76.3 v1(44.7,76.3) 38.8,76.3 37.6,75.1 37.6,67.5 v1(36.3,66.2) 37.5,65 44.9,65 45.45,65.55 v1(45.45,71) v1(49.7,71)
VCC_5V: length 376.9
  TOP w0.508: D3.2 v1(70.4,92) 70.4,95.3 71,95.9 74.5,95.9 74.95,95.45 R1.2 ; U8.5 10.47,22.27 10.05,21.85 R90.1 7.75,21.85 C32.1 ; R19.2 74.95,85.97 74.32,86.6 70.9,86.6 70.4,86.1 v1(70.4,82.5) D7.2 ; C32.1 v1(7.4,20.9) ; C32.1 5.8,22.2 TP7.1 4.3,22.3 3.4,23.2 3.4,38.9 4.2,39.7 RP1.3 ; R64.2 v1(94.5,47.9) ; R71.2 v1(94.5,49.4) ; R16.2 v1(40.4,39.7) ; D8.2 v1(69.25,73.05) ; R59.2 v1(94.5,46.4)
  BOTTOM w0.508: 86.1,17.5 86.1,2.9 84.1,0.9 57.2,0.9 52.6,5.5 10.7,5.5 7.4,8.8 v1(7.4,20.9) ; 86.1,17.5 84.7,18.9 80,18.9 78.6,20.3 78.6,23.91 J2.7 78.5,28.01 78.5,72.2 77.65,73.05 v1(69.25,73.05) ; 86.1,17.5 87.5,18.9 93.3,18.9 94.5,20.1 v1(94.5,46.4) v1(94.5,47.9) v1(94.5,49.4) 95.36,50.26 CN1.5 97.4,50.36 97.4,66.8 96,68.2 86.4,68.2 85.3,69.3 85.3,76.6 84.1,77.8 71.3,77.8 70.4,78.7 v1(70.4,82.5) v1(70.4,92) ; v1(40.4,39.7) RP1.3
VCC_5V_USB: length 17.5
  TOP w0.254: USB1.11 v1(16.1,91.1) 13.7,91.1 13.4,90.8 13.4,88.3 13.8,87.9 U1.4 ; USB1.2 v1(20.9,91.1)
  BOTTOM w0.254: v1(16.1,91.1) v1(20.9,91.1)
VCC_12V: length 241.1
  TOP w0.203: U8.1 13.47,22.3 12.7,22.3 12.5,22.5 12.5,23.97 12.7,24.17 U8.3 ; R86.1 28.13,26.25 C30.1 ; U6.1 13.45,26.8 12.5,26.8 12.2,27.1 12.2,28.5 12.45,28.75 U6.3
  TOP w0.254: C22.1 43.44,46.42 U5.7
  TOP w0.508: D9.1 59.1,50.3 57.3,52.1 37.6,52.1 36.8,51.3 36.8,44.5 37.5,43.8 41,43.8 42.02,44.82 C22.1 ; v1(59.1,16.2) 59.9,16.2 60.15,15.95 D17.1 ; D12.1 v1(59,33)
  TOP w0.762: D9.1 v1(61.3,50.3) 61.3,52 62.2,52.9 76.2,52.9 77.7,54.4 77.7,62.9 76.6,64 20.3,64 19.4,63.1 TP6.1
  BOTTOM w0.508: v1(59.1,16.2) 66,16.2 66.8,17 66.8,29.3 66,30.1 58.51,30.1 58,30.61 58,32.49 58.51,33 v1(59,33) 66.4,33 67.3,33.9 67.3,49.2 66.2,50.3 v1(61.3,50.3)
VCC_24V: length 20.8
  TOP w0.203: R85.2 43.1,24.8 C34.1
  TOP w0.254: R36.2 v1(51.35,68.25)
  TOP w0.711: 67.34,57.4 C20.1 ; C20.1 70.26,57.4 ; C20.1 68.8,58.86
  BOTTOM w0.254: v1(51.35,68.25) v1(51.35,59.15)
  BOTTOM w0.711: C20.1 70.26,57.4 ; C20.1 68.8,58.86 ; C20.1 68.8,55.94
  vias: v1(69.1,12.1) v1(69.2,29.3) v1(69.3,46.6) v1(69.9,12.1) v1(70,29.3) v1(70.1,46.6) v1(70.7,12.1) v1(70.8,59.2) v1(70.8,58.2) v1(70.8,57.2) v1(70.8,56.2) v1(70.8,29.3) v1(70.9,46.6) v1(71.5,12.1) v1(71.6,29.3) v1(71.7,46.6) v1(71.8,59.2) v1(71.8,58.2) v1(71.8,57.2) v1(71.8,56.2) v1(72.6,14) v1(72.7,31.2) v1(72.8,59.2) v1(72.8,58.2) v1(72.8,57.2) v1(72.8,56.2) v1(72.8,48.5) v1(73.4,14) v1(73.5,31.2) v1(73.6,48.5) v1(73.8,59.2) v1(73.8,58.2) v1(73.8,57.2) v1(73.8,56.2) v1(74.2,14) v1(74.2,13) v1(74.2,12) v1(74.3,31.2) v1(74.3,30.2) v1(74.3,29.2) v1(74.4,48.5) v1(74.4,47.5) v1(74.4,46.5) v1(74.8,59.2) v1(74.8,58.2) v1(74.8,57.2) v1(74.8,56.2) v1(75,14) v1(75,13) v1(75,12) v1(75.1,31.2) v1(75.1,30.2) v1(75.1,29.2) v1(75.2,48.5) v1(75.2,47.5) v1(75.2,46.5)
VCC_24V_IN: length 14.2
  TOP w0.711: 14.18,12.56 DC1.1 11.62,14.12
  TOP w2: SW6.4 41.1,11.2 ; 41.1,11.2 39.4,12.9 ; 41.1,11.2 41.1,13 41,13.1 ; DC1.1 17.08,14.12 17.1,14.1 ; 24.4,12.1 24.4,9.61 J3.2
VDDA: length 5.4
  TOP w0.254: U3.9 36.85,72.56 38,71.41 C19.2 R52.1
VSSA: length 6.6
  TOP w0.254: R56.1 C19.1 37.95,69.15 37.3,69.8 37.3,71.4 36.35,72.35 U3.8
BEMF_O: length 30.2
  TOP w0.203: U3.20 43.61,78.81 44.1,79.3 R32.2 45.45,79.45 46,80 53.6,80 54.5,80.9 54.5,93.1 54.7,93.3 56.76,93.3 JP2.2
CH340E_RXD: length 30.7
  TOP w0.203: D1.3 9.3,98.6 9.5,98.8 11.5,98.8 11.7,98.6 11.7,84.5 13,83.2 17.5,83.2 20,85.7 U2.9 22.65,85.7 R20.2
CH340E_TXD: length 28
  TOP w0.203: D1.1 10.3,97.7 11.2,96.8 11.2,84.29 12.79,82.7 17.71,82.7 20.21,85.2 U2.8 21.95,85.2 R22.2
H1: length 50.7
  TOP w0.254: R70.1 v1(91.9,49.4) R71.1 92.75,49.25 93.3,48.7 95.2,48.7 95.7,48.2 95.7,46.98 CN1.3 99.5,43.18 99.5,24.3 99.1,23.9 82.79,23.9 J2.8
H2: length 44.1
  TOP w0.254: R63.1 v1(91.9,47.9) R64.1 92.75,47.85 93.4,47.2 94.53,47.2 95.08,46.64 95.08,46.16 95,46.07 95,45.1 97.46,42.64 CN1.2 98.9,41.24 98.9,28.5 98,27.6 83.11,27.6 J2.6
H3: length 42.2
  TOP w0.254: J2.5 82.9,32.01 82.9,29.5 84.1,28.3 96.7,28.3 97.5,29.1 CN1.1 92.75,44.85 R59.1 v1(91.9,46.4) R58.1
HO1: length 13.8
  TOP w0.254: R68.1 60.8,46.6 60.35,47.05 D10.2 60.05,48.5 58.9,48.5 57.72,49.67 U5.19
HO2: length 27.1
  TOP w0.254: U5.16 54.08,47.73 55.5,46.3 55.5,34.5 57.9,32.1 59.2,32.1 60.25,31.05 D13.2 60.25,29.75 60.7,29.3 R77.1
HO3: length 40.7
  TOP w0.254: R92.1 60.6,12.1 60.15,12.55 D18.2 60.15,13.95 58.1,16 58.1,29 53.45,33.65 53.45,45.03 52.71,45.77 U5.13
IR_SUM: length 84.9
  TOP w0.203: R38.1 v1(53.6,90.35)
  TOP w0.711: 62.46,21.26 JP12.2 61,19.8 ; 61.1,37.1 JP11.2 62.56,38.56 ; 62.36,4.06 JP13.2 60.9,2.6
  BOTTOM w0.203: v1(53.6,90.35) 52.6,89.35 52.6,72.9 50.7,71 50.7,38.8 51.8,37.7 52.5,37.7
  BOTTOM w0.711: 60.9,2.6 JP13.2 62.36,4.06 ; 62.46,21.26 JP12.2 61,19.8
  vias: v1(56.9,37.7) v1(56.9,36.7) v1(57.9,37.7) v1(57.9,36.7) v1(58.9,37.7) v1(58.9,36.7) v1(59.8,3.2) v1(59.8,2.2) v1(59.9,37.7) v1(59.9,36.7) v1(59.9,20.4) v1(59.9,19.4) v1(60.8,3.2) v1(60.8,2.2) v1(60.9,37.7) v1(60.9,36.7) v1(60.9,20.4) v1(60.9,19.4) v1(61.9,7.4) v1(61.9,6.4) v1(61.9,5.4) v1(61.9,4.4) v1(62,24.6) v1(62,23.6) v1(62,22.6) v1(62,21.6) v1(62.9,7.4) v1(62.9,6.4) v1(62.9,5.4) v1(62.9,4.4) v1(63,24.6) v1(63,23.6) v1(63,22.6) v1(63,21.6)
IR_U: length 57.2
  TOP w0.254: R72.1 65.81,45.26 Q1.3 ; R48.1 48.35,67 48.65,66.7 v1(52.6,66.7)
  TOP w0.711: 66.56,37.1 JP11.1 65.1,38.56
  BOTTOM w0.203: JP11.1 65.1,44 64.3,44.8 52.8,44.8 52.6,45 v1(52.6,66.7)
IR_V: length 95.4
  TOP w0.203: R34.1 v1(53.6,77.5)
  TOP w0.254: R83.1 65.71,27.96 Q2.3
  TOP w0.711: 65,21.26 JP12.1 66.46,19.8
  BOTTOM w0.203: JP12.1 65,28.5 64.3,29.2 57.7,29.2 57.2,29.7 57.2,34.3 57.7,34.8 66.1,34.8 66.6,35.3 66.6,44 64.9,45.7 54.6,45.7 53.6,46.7 v1(53.6,77.5)
IR_W: length 116.5
  TOP w0.203: R40.1 v1(53.6,82.1)
  TOP w0.254: Q3.3 65.61,10.76 R94.1
  TOP w0.711: 64.9,4.06 JP13.1 66.36,2.6
  BOTTOM w0.203: v1(68.7,6) 76.7,6 76.9,6.2 76.9,68.4 76.7,68.6 55.8,68.6 55,69.4 55,80.7 v1(53.6,82.1)
LO1: length 13.9
  TOP w0.254: R69.1 60.7,45.4 60.35,45.05 D11.2 v1(59.1,43.8) ; U5.11 v1(51.3,43.8)
  BOTTOM w0.254: v1(51.3,43.8) v1(59.1,43.8)
LO2: length 30.5
  TOP w0.254: R82.1 v1(60.25,28.1) D14.2 ; U5.10 46.71,44.48 47.05,44.13 47.05,39.95 51.4,35.6 51.4,32.6 v1(55.9,28.1)
  BOTTOM w0.254: v1(60.25,28.1) v1(55.9,28.1)
LO3: length 48.4
  TOP w0.254: R93.1 60.5,10.9 60.15,10.55 D19.2 58.4,9.3 56.6,11.1 56.6,28.3 52.1,32.8 52.1,35.82 47.7,40.22 47.7,44.4 46.98,45.12 U5.9
MOTOR_U: length 100.6
  TOP w0.254: Q1.1 65.85,47.8 R66.2 v1(65.6,48.4) ; v1(58,48.4) 57.38,49.02 U5.18
  TOP w2.54: 88.6,30.3 88.41,30.11 J2.2
  BOTTOM w0.254: J2.2 88.4,32.41 88.4,35.4 84.3,39.5 84.3,75.4 82.9,76.8 70.7,76.8 69.6,77.9 69.6,89.96 JP3.2 ; v1(58,48.4) v1(65.6,48.4)
MOTOR_V: length 100
  TOP w0.254: Q2.1 65.75,30.5 R76.2 ; v1(58.9,31.5) 57.6,31.5 54.8,34.3 54.8,45.9 53.62,47.08 51.3,47.08
  TOP w2.54: 85.9,36.8 86.1,36.6 J2.1
  BOTTOM w0.254: v1(58.9,31.5) v1(68.3,31.5) ; J2.1 83.5,36.91 83.5,74.3 82.5,75.3 70.1,75.3 68.4,77 68.4,81.73 JP6.2
MOTOR_W: length 118.3
  TOP w0.254: R91.2 65.65,13.3 Q3.1 ; U5.12 52.27,45.12 52.8,44.6 52.8,33.2 57.35,28.65 57.35,15.55 v1(58.7,14.2)
  TOP w2.54: J2.4 86.1,19.5
  BOTTOM w0.254: v1(58.7,14.2) v1(68.2,14.2) ; JP9.2 66.34,74.2 81.8,74.2 82.6,73.4 82.6,25.21 J2.4
NRST: length 55.6
  TOP w0.203: SW1.3 3.22,89.6 4.8,89.6 5.4,89 5.4,74.9 6.3,74 31.5,74 32.6,75.1 35.65,75.1 35.85,74.9 U3.7 35.85,72.25 36.9,71.2 36.9,69.74 36.31,69.15 C18.1 R55.2
OSC_IN: length 5.9
  TOP w0.203: X1.1 32.5,70.3 33.2,71 34.4,71 34.85,71.45 U3.5
OSC_OUT: length 4.4
  TOP w0.203: X1.3 34.9,70.4 35.35,70.85 U3.6
PA0/BEMF_U: length 84.9
  TOP w0.203: v1(39.5,71.6) 38.6,71.6 37.35,72.85 U3.10
  TOP w0.254: C3.1 84.69,93.26 JP5.2
  BOTTOM w0.203: JP5.2 89.01,94.97 89.01,96.91 88.32,97.6 52.78,97.6 51.9,96.72 51.9,73.32 50.18,71.6 v1(39.5,71.6)
PA1/BEMF_V: length 94.7
  TOP w0.203: v1(39.5,72.3) 38.61,72.3 37.85,73.06 U3.11
  TOP w0.254: C9.1 84.68,83.83 JP8.2
  BOTTOM w0.203: v1(39.5,72.3) 49.89,72.3 51.2,73.61 51.2,97.01 52.49,98.3 88.61,98.3 89.5,97.41 89.5,86.03 JP8.2
PA2/BEMF_W: length 104.7
  TOP w0.203: v1(39.5,73) 38.7,73 38.35,73.35 U3.12
  TOP w0.254: JP10.2 87.24,74.1 C16.1
  BOTTOM w0.203: JP10.2 90,76.86 90,97.9 88.9,99 52.2,99 50.5,97.3 50.5,73.9 49.6,73 v1(39.5,73)
PA3: length 9.1
  TOP w0.203: U3.13 40.29,75.31 42.5,73.1 TP4.1 42.5,71.02 C14.1 44.13,70.05 R47.2
PA4: length 9.9
  TOP w0.203: U3.14 40.49,75.81 41.6,74.7 43.5,74.7 44.3,73.9 45.66,73.9 46.35,73.21 R39.1 ; R39.1 R35.2 ; R39.1 R48.2
PA5: length 8.3
  TOP w0.203: R27.1 R43.2 46.35,74.61 45.76,75.2 42,75.2 40.89,76.31 U3.15
PA6: length 2.8
  TOP w0.203: TP3.1 42.19,76.81 U3.16
PA7/VDC: length 23.4
  TOP w0.203: R36.1 R31.2 C10.1 54.1,71.5 54.4,71.8 TP1.1 U4.2 U4.3 50.1,75.6 44.5,75.6 42.79,77.31 U3.17
PA8: length 22.6
  TOP w0.203: U3.29 36.35,77.55 41.7,72.2 41.7,67.21 42.31,66.6 44.75,66.6 R41.1 R42.1
PA11: length 6
  TOP w0.203: R51.2 36.3,86.65 36.3,85.8 35.75,85.25 C13.1 34.85,84.5 U3.32
PA12: length 5.7
  TOP w0.203: R50.2 R45.1 33.35,86.15 34.25,85.25 C11.1 34.35,85.2 U3.33
PA15/TIM_CH3N: length 62
  TOP w0.203: 45.1,47.08 v1(47.21,47.08) ; v1(29.4,80.7) 30.3,80.7 30.69,80.31 U3.38
  TOP w0.254: R67.1 42.57,46.7 42.95,47.08 45.1,47.08
  BOTTOM w0.203: v1(47.21,47.08) 28.03,47.08 27.2,47.9 27.2,80 27.9,80.7 v1(29.4,80.7)
PB0: length 9.3
  TOP w0.203: R24.1 46.35,77.51 45.66,78.2 44.2,78.2 43.81,77.81 U3.18 ; R24.1 R34.2 ; R24.1 R26.2
PB1: length 8
  TOP w0.203: R30.2 R32.1 46.35,79.29 45.66,78.6 44,78.6 43.71,78.31 U3.19
PB3/TIM_CH3: length 59.5
  TOP w0.203: U3.39 30.49,79.81 30.16,80.14 v1(28.7,80.14) ; U5.3 v1(46.7,49.02)
  TOP w0.254: U5.3 43.23,49.02 43,48.8 R61.1
  BOTTOM w0.203: v1(46.7,49.02) 47.73,49.02 47.93,49.23 47.93,50.91 47.44,51.4 31,51.4 30.5,51.9 30.5,79.24 29.6,80.14 v1(28.7,80.14)
PB4/TIM_CH2N: length 60.5
  TOP w0.203: U3.40 30.39,79.31 30.12,79.58 v1(29.37,79.58) ; U5.5 v1(46.7,47.73)
  TOP w0.254: R65.1 42.7,47.4 43.02,47.73 U5.5
  BOTTOM w0.203: v1(46.7,47.73) 28.3,47.73 27.6,48.42 27.6,79 28.18,79.58 v1(29.37,79.58)
PB5/TIM_CH2: length 54.6
  TOP w0.203: v1(28.7,79) 30.1,79 30.29,78.81 U3.41 ; U5.2 v1(47.21,49.67)
  TOP w0.254: R60.1 42.62,49.67 U5.2
  BOTTOM w0.203: v1(28.7,79) 29.59,79 30.08,78.51 30.08,51.72 30.8,51 46.92,51 47.28,50.64 47.28,49.75 v1(47.21,49.67)
PB6/TIM_CH1N: length 56.9
  TOP w0.203: U5.4 v1(47.21,48.38) ; U3.42 29.49,78.31 v1(29.4,78.4)
  TOP w0.254: U5.4 42.73,48.38 R62.1
  BOTTOM w0.203: v1(29.4,78.4) 28.5,78.4 28,77.9 28,48.94 28.57,48.38 v1(47.21,48.38)
PB7/TIM_CH1: length 53.1
  TOP w0.203: v1(28.7,77.81) U3.43 ; U5.1 v1(46.7,50.33)
  TOP w0.254: R57.1 40.48,50.33 U5.1
  BOTTOM w0.203: v1(28.7,77.81) 29.65,76.86 29.65,51.55 30.6,50.6 46.42,50.6 v1(46.7,50.33)
PB8/UART1_RX: length 38.2
  TOP w0.203: R22.1 v1(24.9,84) 29.4,84 32.6,80.8 32.6,77.3 32.11,76.81 U3.45
  BOTTOM w0.254: v1(24.9,84) 26.7,84 30.2,87.5 30.2,92 31.35,93.15 38.56,93.15 40.17,94.77 J1.7
PB9/UART1_TX: length 38.4
  TOP w0.203: U3.46 32.21,76.31 33.1,77.2 33.1,80.8 28.7,85.2 v1(24.9,85.2) R20.1
  BOTTOM w0.254: J1.5 38.9,94.77 38.13,94 30.8,94 29.3,92.5 29.3,87.6 26.9,85.2 v1(24.9,85.2)
PB10: length 6.2
  TOP w0.203: R44.2 44.9,80.7 43.7,79.5 TP2.1 42.31,79.31 U3.21
PB11: length 8.6
  TOP w0.203: R37.2 R44.1 46.35,80.85 45.8,81.4 44.9,81.4 43.8,80.3 42.1,80.3 41.61,79.81 U3.22
PB12: length 12.2
  TOP w0.203: U3.25 38.35,83.65 38.8,84.1 45.6,84.1 46.35,83.35 R29.2 R33.1 R40.2
PB13/SPEED: length 3.1
  TOP w0.203: R17.2 38.3,84.2 37.85,83.75 U3.26
PB14/TEMP: length 72.1
  TOP w0.203: v1(37.5,84.4) 37.35,84.25 U3.27 ; R16.1 C4.2
  TOP w0.254: R75.1 42.25,41.45 R16.1 ; v1(38.3,41.45) C4.2
  BOTTOM w0.203: v1(37.5,84.4) 36.4,83.3 29.2,83.3 25.4,79.5 25.4,41.9 25.85,41.45 v1(38.3,41.45)
PB15: length 9.2
  TOP w0.203: 37.05,87.35 C15.1 ; 37.05,87.35 36.85,87.15 U3.28 ; 37.05,87.35 36.95,87.35 36.4,87.9 36.4,88.9 36.95,89.45 R53.2 R38.2
PC13/KEY2: length 32
  TOP w0.203: SW3.3 5.9,72.9 33.11,72.9 33.35,73.14 U3.2
PC14/KEY3: length 42.1
  TOP w0.203: SW4.3 4.38,61.58 4.38,70.81 6.07,72.5 33.41,72.5 33.85,72.94 U3.3
PC15/KEY4: length 52.4
  TOP w0.203: U3.4 34.35,72.73 33.72,72.1 6.23,72.1 4.77,70.63 4.77,51.97 SW5.3
PD2/LED0: length 12.9
  TOP w0.203: R15.1 29.8,86.51 33.35,82.96 U3.35
PD3/LED1: length 13.4
  TOP w0.203: R14.1 28,87.6 32.85,82.75 U3.36
PD7/KEY1: length 35.7
  TOP w0.203: U3.1 32.85,73.5 32.65,73.3 5,73.3 4.4,73.9 4.4,78.8 SW2.3
SV: length 55.4
  TOP w0.203: R41.2 R47.1 45.45,69.15 45.9,69.6 47,69.6 47.2,69.4 47.2,66.3 ; 47.2,66.3 47.7,65.8 56,65.8 56.8,66.6 JP1.3 ; 47.2,66.3 46.7,65.8 42.4,65.8 41.2,67 41.2,72.2 35.99,77.4 35.99,77.51 35.85,77.65 U3.30
SWCLK: length 32.9
  TOP w0.203: v1(24.9,82.9) 29.8,82.9 31.35,81.35 U3.37
  BOTTOM w0.254: J1.3 37.63,94.95 37.38,94.7 30.2,94.7 28.5,93 28.5,87.6 26.9,86 24.2,86 23.7,85.5 23.7,83.5 24.3,82.9 v1(24.9,82.9)
SWDIO: length 17.6
  TOP w0.203: J1.1 33.06,95.77 32.4,95.1 32.4,84.6 33.85,83.15 U3.34
U_S_IN: length 30.3
  TOP w0.203: JP1.2 55.3,82.33 55.3,68.3 54.4,67.4 49.4,67.4 49,67.8 49,74.4 48.8,74.6 R27.2
USB_DM: length 12.4
  TOP w0.203: U2.2 17.04,85.7 17.08,85.75 18.02,85.75 18.71,86.43 18.71,89.41 18.7,89.41 18.7,89.7 18.91,89.9 ; 18.91,89.9 U1.2 ; 18.91,89.9 18.9,89.9 18.25,90.55 18.25,91.5 ; USB1.5 19.25,91.65 19.1,91.5 18.25,91.5 ; USB1.7 18.25,91.5
USB_DP: length 12.6
  TOP w0.203: USB1.6 18.75,93.65 18.5,93.9 17.9,93.9 17.75,93.75 USB1.8 17.75,90.25 U1.3 18.09,89.9 18.3,89.7 18.3,89.24 18.3,89.24 18.3,86.6 17.85,86.15 17.08,86.15 17.04,86.2 U2.1
VB1: length 15.9
  TOP w0.254: D9.2 63.85,50.05 63.06,49.26 58.94,49.26 57.88,50.33 U5.20
  TOP w0.762: D9.2 C21.1
VB2: length 28.1
  TOP w0.254: U5.17 54.52,48.38 56.1,46.8 56.1,35 56.9,34.2 62.55,34.2 D12.2
  TOP w0.762: D12.2 C23.1
VB3: length 40.8
  TOP w0.254: U5.14 53.27,46.42 54.1,45.6 54.1,34 58.85,29.25 58.85,17.95 59.8,17 62.45,17 D17.2
  TOP w0.762: D17.2 C37.1
N17256471: length 2.7
  TOP w0.203: U3.44 29.36,77.31 R28.2
N17256486: length 1.6
  TOP w0.203: D4.2 27.3,95.15 R18.2
N17256513: length 4.4
  TOP w0.203: USB1.10 16.75,90.35 16.15,89.75 R12.1
N17256515: length 4.5
  TOP w0.203: R13.2 21.05,89.75 19.75,91.05 USB1.4
N17279585: length 1.4
  TOP w0.203: R4.1 10.4,95.9 D1.2
N17279608: length 1.4
  TOP w0.203: R3.1 9.2,95.9 D1.4
N17297966: length 34.8
  TOP w0.203: R30.1 v1(49.2,79.3) ; R51.1 v1(35.6,89.1) ; R37.1 v1(49.2,80.7) ; R43.1 v1(44.6,74.6)
  BOTTOM w0.203: v1(44.6,74.6) 48.5,74.6 49.2,75.3 v1(49.2,79.3) v1(49.2,80.7) 49.2,87.5 47.6,89.1 v1(35.6,89.1)
N17303513: length 5.5
  TOP w0.254: D10.1 64.05,48 R68.2 65.55,46.6 R66.1 65.72,46.53 Q1.2
N17303600: length 5.5
  TOP w0.254: 64.05,44 64.2,44.15 R72.2 65.76,43.99 Q1.4 ; 64.05,44 D11.1 ; 64.05,44 R69.2
N17305088: length 5.5
  TOP w0.254: D13.1 63.95,30.7 R77.2 65.45,29.3 R76.1 65.62,29.23 Q2.2
N17305164: length 5.5
  TOP w0.254: R82.2 63.95,26.7 ; 63.95,26.7 D14.1 ; 63.95,26.7 64.1,26.85 R83.2 65.66,26.69 Q2.4
N17305624: length 5.5
  TOP w0.254: Q3.2 65.52,12.03 R91.1 65.35,12.1 R92.2 63.85,13.5 D18.1
N17305700: length 5.5
  TOP w0.254: Q3.4 65.56,9.49 R94.2 64,9.65 63.85,9.5 ; 63.85,9.5 R93.2 ; 63.85,9.5 D19.1
N17307857: length 79.2
  TOP w0.203: v1(37.49,85.4) 37.5,85.4 38.25,86.15 R17.1 C5.1
  BOTTOM w0.203: v1(37.49,85.4) 35.89,83.8 28.8,83.8 26.3,81.3 7.4,81.3 6.2,80.1 6.2,38.4 RP1.2
N17309304: length 3.5
  TOP w0.254: R5.1 73,93.9 72.75,94.15 D2.1 72.75,94.85 73,95.1 R1.1
N17309352: length 3.5
  TOP w0.254: JP3.1 67.6,94.5 D2.2
N17309419: length 8.3
  TOP w0.254: D3.1 72.75,92.35 73,92.6 R7.2 74.05,92.45 74.95,91.55 R9.2 75.63,90.72 JP4.3
N17309488: length 5.4
  TOP w0.254: JP4.1 78.4,94.6 75.7,94.6 75,93.9 R5.2
N17309495: length 13.2
  TOP w0.254: R8.1 64.82,92.2 JP3.3 73.37,90.72 R9.1
N17309514: length 11.3
  TOP w0.254: C2.1 79.56,93.3 JP4.2 82.14,90.72 JP5.3
N17309709: length 47.6
  TOP w0.254: JP5.1 90.15,92.95 R70.2
N17309934: length 39.6
  TOP w0.254: JP8.1 89.4,84.27 89.4,48.7 90.15,47.95 R63.2
N17309953: length 3.4
  TOP w0.254: R21.1 73.05,84.4 72.75,84.7 D6.1 72.75,85.3 73.05,85.6 R19.1
N17309955: length 8.2
  TOP w0.254: JP7.3 75.56,81.29 R25.2 74.95,81.95 74.05,82.85 R23.2 73.1,83.1 72.75,82.75 D7.1
N17309983: length 3.5
  TOP w0.254: JP6.1 67.67,85 D6.2
N17309989: length 5.5
  TOP w0.254: JP7.1 78.33,85.1 75.65,85.1 R21.2
N17310005: length 11.3
  TOP w0.254: C8.1 79.57,83.8 JP7.2 82.14,81.29 JP8.3
N17310013: length 20.8
  TOP w0.254: R25.1 73.44,81.29 JP6.3 64.5,83.09 64.5,90.3 63.8,91 R10.1
N17310426: length 18.6
  TOP w0.254: R46.2 74.95,75.55 74.05,74.65 R49.2 ; D8.1 R49.2 ; R49.2 C17.1 74.05,72.35 74.78,71.62 JP10.3
N17310462: length 31.5
  TOP w0.254: JP10.1 88.8,75.2 88.8,47.8 90.15,46.45 R58.2
N17310486: length 2.6
  TOP w0.254: R54.2 66.32,71.6 JP9.3
N17311196: length 23.8
  TOP w0.254: R46.1 73.05,76.7 JP9.1 63.7,79.3 63.7,89 62.9,89.8 R11.1
N17311295: length 3.6
  TOP w0.254: R11.2 R10.2 R8.2 R6.1
N17311437: length 6.8
  TOP w0.254: R6.2 61.75,93.6 60.85,94.5 R2.2 C1.1 JP2.1
N17322936: length 3.4
  TOP w0.203: R14.2 28,97 28.7,97.7 D5.2
N17322948: length 3.8
  TOP w0.203: R15.2 30.5,95.35 30.5,97 D5.4
N17331274: length 11.5
  TOP w2: F1.1 47.7,12.65 SW6.3
N17333710: length 3.2
  TOP w0.203: R84.2 R78.1 9.4,28.75 U6.4
N17334296: length 3.1
  TOP w0.203: U8.4 9.32,24.17 R88.1 R90.2
N17334949: length 2.5
  TOP w0.203: C36.1 40.8,23.2 40.31,23.69 U7.1
N17334953: length 6.9
  TOP w0.203: C36.2 v1(40.8,19.7)
  BOTTOM w0.203: v1(40.8,19.7) v1(35.2,19.7)
N17335086: length 9.7
  TOP w0.203: U7.5 34.4,29.9 34.1,30.2 30.8,30.2 30.5,29.9 30.5,29.1 29.75,28.35 R79.1 R86.2
N17335114: length 4.8
  TOP w0.203: R81.2 R85.1 42.95,27.25 41.93,26.23 U7.3
N17335118: length 3.2
  TOP w0.203: U7.6 32.42,26.23 C31.1 R87.2
N17335142: length 2.5
  TOP w0.203: R80.2 41.05,27.5 U7.4
N17335200: length 1.2
  TOP w0.203: R87.1 C24.1

## Copper pours and planes (outline as drawn; the poured copper is in the pictures)
GND on TOP: 99.7,3.6 98.73,1.27 96.4,0.3 3.6,0.3 1.27,1.27 0.3,3.6 0.3,96.4 1.27,98.73 3.6,99.7 96.4,99.7 98.73,98.73 99.7,96.4 ; 40 cut-outs
GND on BOTTOM: 99.7,3.6 98.73,1.27 96.4,0.3 3.6,0.3 1.27,1.27 0.3,3.6 0.3,96.4 1.27,98.73 3.6,99.7 96.4,99.7 98.73,98.73 99.7,96.4 ; 20 cut-outs
VCC_12V on TOP: 28.4,27.2 12.8,27.2 12.8,26.4 15.3,26.4 15.5,26.2 17.3,26.2 17.5,26 17.5,22.9 17.2,22.6 12.9,22.6 12.9,21.7 19.8,21.7 20.2,21.3 20.2,17.9 23.2,17.9 23.2,24.2 23.7,24.7 27.9,24.7 28.4,25.2
VCC_24V on TOP (solid shape): 75.3,14.3 75.3,11.9 75.1,11.7 69,11.7 68.8,11.9 68.8,12.3 68.94,12.44 71.59,12.44 71.65,12.5 71.7,12.5 72.2,13 72.2,14.3 72.24,14.34 75.26,14.34
VCC_24V on TOP (solid shape): 75.4,31.5 75.4,29.1 75.2,28.9 69.1,28.9 68.9,29.1 68.9,29.5 69.04,29.64 71.69,29.64 71.75,29.7 71.8,29.7 72.3,30.2 72.3,31.5 72.34,31.54 75.36,31.54
VCC_24V on TOP (solid shape): 75.5,48.8 75.5,46.4 75.3,46.2 69.2,46.2 69,46.4 69,46.8 69.14,46.94 71.79,46.94 71.85,47 71.9,47 72.4,47.5 72.4,48.8 72.44,48.84 75.46,48.84
VCC_24V on TOP: 39,24.6 40.7,24.6 41.8,23.5 48.7,23.5 49.6,24.4 49.6,35.4 47.9,37.1 35.5,37.1 34.3,38.3 34.3,54.3 35.6,55.6 74.8,55.6 75.5,56.3 75.5,59.4 75.2,59.7 31.6,59.7 30.1,58.2 30.1,34.6 31.3,33.4 46,33.4 46.8,32.6 46.8,28.7 46.2,28.1 44.2,28.1 44.2,25.8 44,25.6 39.1,25.6 39,25.5
VCC_24V on BOTTOM: 68.1,59.7 75.1,59.7 75.4,59.4 75.4,12 75.1,11.7 68.1,11.7 67.7,12.1 67.7,59.3
VCC_24V_IN on TOP: 17.6,13.1 22.7,13.1 23.2,12.6 23.2,8.8 23.6,8.4 25.2,8.4 25.5,8.7 25.5,11.2 25.9,11.6 39.1,11.6 39.5,11.2 39.5,10 40,9.5 42.1,9.5 42.6,10 42.6,14.9 41.6,15.9 11.4,15.9 11.2,15.7 11.2,12.2 11.6,11.8 16.3,11.8
(no net) on TOP: 59.6,25 59.6,19.2 59.9,18.9 62.9,18.9 63.4,19.4 63.4,24.8 63.2,25
(no net) on TOP: 66.7,12.9 71.4,12.9 71.7,13.2 71.7,14.6 71.9,14.8 75.6,14.8 75.8,14.6 75.8,11.3 75.6,11.1 72.1,11.1 72.1,9.1 86.6,9.1 87.4,9.9 87.4,22.4 86.8,23 85.4,23 84.8,22.4 84.8,17.4 84.2,16.8 67.9,16.8 67.9,14 67.6,13.7 66.7,13.7
(no net) on TOP: 59.5,7.8 59.5,2 59.8,1.7 62.8,1.7 63.3,2.2 63.3,7.6 63.1,7.8
(no net) on TOP: 72,45.2 71.6,45.6 67,45.6 67,44.9 68.9,44.9 69.1,44.7 69.1,42.5 68.9,42.3 64.5,42.3 64.2,42 64.2,36.2 71.6,36.2 72,36.6
(no net) on TOP: 63,36.2 63.5,36.7 63.5,42.1 63.3,42.3 56.6,42.3 56.6,36.6 57,36.2
(no net) on TOP: 75.2,28.9 75.4,29.1 75.4,31.5 75.3,31.6 72.4,31.6 72.3,31.5 72.3,30.2 71.8,29.7 69.1,29.7 68.9,29.5 68.9,29.1 69.1,28.9
(no net) on TOP: 71.9,27.9 71.5,28.3 66.9,28.3 66.9,27.6 68.8,27.6 69,27.4 69,25.2 68.8,25 64.4,25 64.1,24.7 64.1,18.9 71.5,18.9 71.9,19.3
(no net) on TOP: 75.1,11.7 75.3,11.9 75.3,14.3 75.2,14.4 72.3,14.4 72.2,14.3 72.2,13 71.7,12.5 69,12.5 68.8,12.3 68.8,11.9 69,11.7
(no net) on TOP: 66.8,30.1 71.5,30.1 71.8,30.4 71.8,31.8 72,32 75.7,32 75.9,31.8 75.9,28.5 75.7,28.3 72.2,28.3 72.2,26.3 78.1,26.3 78.6,26.8 78.6,36 79.1,36.5 84.4,36.5 84.8,36.1 84.8,33.6 85.4,33 86.8,33 87.4,33.6 87.4,39.4 86.6,40.2 73.7,40.2 73,39.5 73,34.7 72.3,34 68,34 68,31.2 67.7,30.9 66.8,30.9
(no net) on TOP: 66.9,47.4 71.6,47.4 71.9,47.7 71.9,49.1 72.1,49.3 75.8,49.3 76,49.1 76,45.8 75.8,45.6 72.3,45.6 72.3,41.8 73.1,41 87.5,41 88.6,39.9 88.6,32 88.1,31.5 85.4,31.5 84.8,30.9 84.8,29.3 85.3,28.8 91.3,28.8 92.2,29.7 92.2,42.1 89.8,44.5 79.4,44.5 78.7,45.2 78.7,51 78.4,51.3 68.1,51.3 68.1,48.5 67.8,48.2 66.9,48.2
(no net) on TOP: 75.3,46.2 75.5,46.4 75.5,48.8 75.4,48.9 72.5,48.9 72.4,48.8 72.4,47.5 71.9,47 69.2,47 69,46.8 69,46.4 69.2,46.2
(no net) on TOP: 71.8,10.7 71.4,11.1 66.8,11.1 66.8,10.4 68.7,10.4 68.9,10.2 68.9,8 68.7,7.8 64.3,7.8 64,7.5 64,1.7 71.4,1.7 71.8,2.1
IR_SUM on TOP (solid shape): 63.3,7.6 63.3,3.98 63.2,3.8 63,3.8 62.69,3.92 62.36,3.96 61.4,3.56 61,2.6 61.04,2.29 61.15,1.99 61.14,1.8 60.96,1.7 59.8,1.7 59.5,2 59.5,7.8 63.1,7.8
IR_SUM on TOP (solid shape): 63.4,24.8 63.4,21.18 63.3,21 63.1,21 62.79,21.12 62.46,21.16 61.5,20.76 61.1,19.8 61.14,19.49 61.25,19.19 61.24,19 61.06,18.9 59.9,18.9 59.6,19.2 59.6,25 63.2,25
IR_SUM on TOP (solid shape): 63.5,42.1 63.5,38.48 63.4,38.3 63.2,38.3 62.89,38.42 62.56,38.46 61.6,38.06 61.2,37.1 61.24,36.79 61.35,36.49 61.34,36.3 61.16,36.2 57,36.2 56.6,36.6 56.6,42.3 63.3,42.3
IR_SUM on BOTTOM: 52.6,38.6 63.2,38.6 63.5,38.3 63.5,36.7 63,36.2 55.8,36.2 55.2,35.6 55.2,25.5 55.7,25 63.2,25 63.4,24.8 63.4,19.3 63,18.9 58.3,18.9 57.9,18.5 57.9,8.4 58.5,7.8 63.1,7.8 63.3,7.6 63.3,2.2 62.8,1.7 55.5,1.7 54.5,2.7 54.5,12.5 51.7,15.3 51.7,37.7
IR_U on TOP (solid shape): 72,45.2 72,36.6 71.6,36.2 66.46,36.2 66.46,38 66.32,38.32 66,38.46 64.2,38.46 64.2,42 64.5,42.3 68.9,42.3 69.1,42.5 69.1,44.7 68.9,44.9 67,44.9 67,45.6 71.6,45.6
IR_V on TOP (solid shape): 71.9,27.9 71.9,19.3 71.5,18.9 66.36,18.9 66.36,20.7 66.22,21.02 65.9,21.16 64.1,21.16 64.1,24.7 64.4,25 68.8,25 69,25.2 69,27.4 68.8,27.6 66.9,27.6 66.9,28.3 71.5,28.3
IR_W on TOP (solid shape): 71.8,10.7 71.8,2.1 71.4,1.7 66.26,1.7 66.26,3.5 66.12,3.82 65.8,3.96 64,3.96 64,7.5 64.3,7.8 68.7,7.8 68.9,8 68.9,10.2 68.7,10.4 66.8,10.4 66.8,11.1 71.4,11.1
MOTOR_U on TOP (solid shape): 78.7,51 78.7,45.2 79.4,44.5 89.8,44.5 92.2,42.1 92.2,29.7 91.38,28.88 87.71,28.88 87.53,28.99 87.54,29.2 87.74,29.64 87.81,30.11 87.71,30.67 87.44,31.17 87.42,31.39 87.6,31.5 88.1,31.5 88.6,32 88.6,39.9 87.5,41 73.1,41 72.46,41.64 72.46,45.39 72.42,45.43 72.4,45.54 72.49,45.6 75.8,45.6 76,45.8 76,49.1 75.8,49.3 72.1,49.3 71.9,49.1 71.9,47.7 71.6,47.4 66.9,47.4 66.9,48.2 67.8,48.2 68.1,48.5 68.1,51.3 78.4,51.3
MOTOR_V on TOP (solid shape): 87.4,39.4 87.4,35.88 87.29,35.7 87.08,35.71 86.1,36.02 85.12,35.71 84.91,35.7 84.8,35.88 84.8,36.1 84.4,36.5 79.1,36.5 78.6,36 78.6,26.8 78.1,26.3 72.36,26.3 72.36,28.09 72.32,28.13 72.3,28.24 72.39,28.3 75.7,28.3 75.9,28.5 75.9,31.8 75.7,32 72,32 71.8,31.8 71.8,30.4 71.5,30.1 66.8,30.1 66.8,30.9 67.7,30.9 68,31.2 68,34 72.3,34 73,34.7 73,39.5 73.7,40.2 86.6,40.2
MOTOR_W on TOP (solid shape): 84.8,20.15 84.91,20.33 85.12,20.32 86.1,20.01 87.08,20.32 87.29,20.33 87.4,20.15 87.4,9.9 86.6,9.1 72.26,9.1 72.26,10.89 72.22,10.93 72.2,11.04 72.29,11.1 75.6,11.1 75.8,11.3 75.8,14.6 75.6,14.8 71.9,14.8 71.7,14.6 71.7,13.2 71.4,12.9 66.7,12.9 66.7,13.7 67.6,13.7 67.9,14 67.9,16.8 84.2,16.8 84.8,17.4
N17334953 on TOP: 35.2,24.1 31.1,24.1 30.9,23.9 30.9,18 35.7,18 36,18.3 36,22.2 35.2,23

## Text on the board
Ref Des/Silkscreen Top: 3V3 | 5V | KEY3 | KEY4 | NRST | KEY1 | KEY2 | 12V | 24V | GND | NTC | ON | OFF | MM32SPIN27PF_V10 | 220608 | XXXLZJXXX | H3 | H2 | H1 | V | U | G | W
BODY_CENTER: FIGURE | FINISHED_SIZE | 0.254 | 0.6 | 0.9 | 1.0 | 1.1 | 1.5 | 1.6 | 1.8 | 3.3 | 1.2x0.6 | 1.7x0.6 | 3.0x1.0 | DRILL CHART: TOP to BOTTOM | ALL UNITS ARE IN MILLIMETERS | ROTATION | - | 90.000 | 0.000 | PLATED | QTY | 370 | 13 | 2 | 10 | 43 | 4 | 3 | 8 | 1 | 464 | TOTAL HOLES:
